# Altium PCB CM5_R6_Serigrafia_VIRTUS.PcbDoc (part 1 of 3)
Units mil, origin at the board's own origin, x right, y up, seen from the top; angles counter-clockwise.
Board outline 7086.61 x 4724.41 mil, 4 copper layers (Top Layer, GND L2, GND L3, Bottom Layer), stack 62.992 mil thick; 227 components, 122 nets, 905 pads, 209 vias.
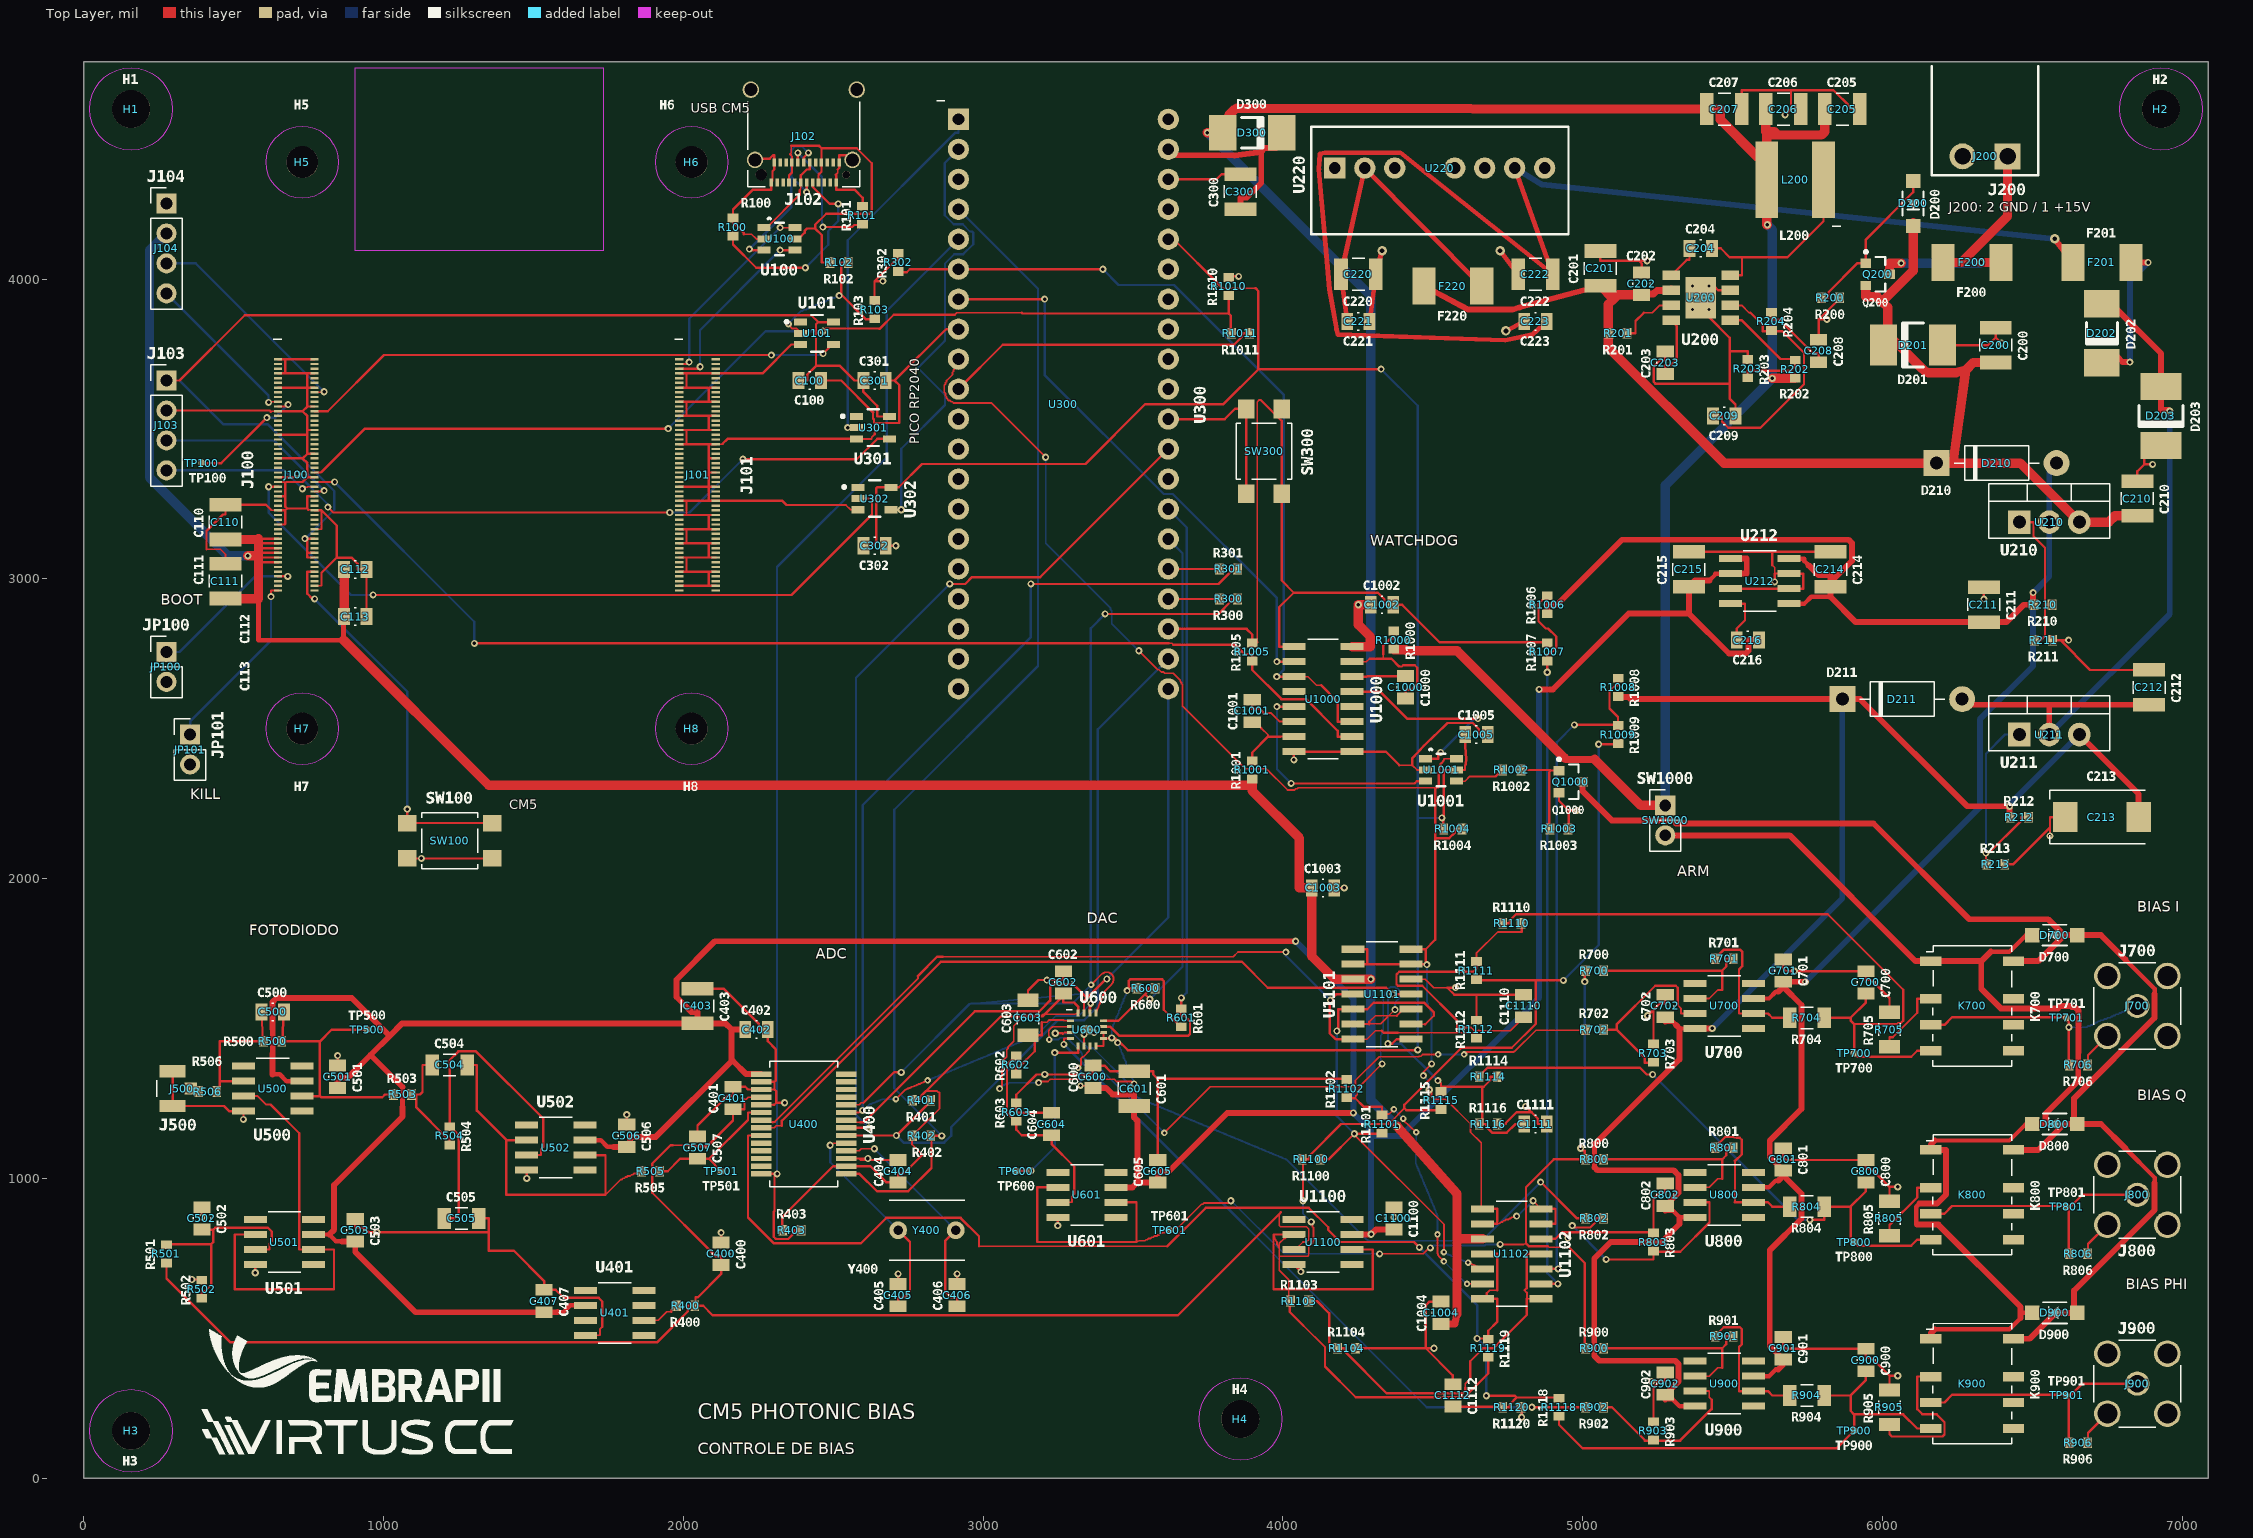
[diagram p0: Top Layer view]
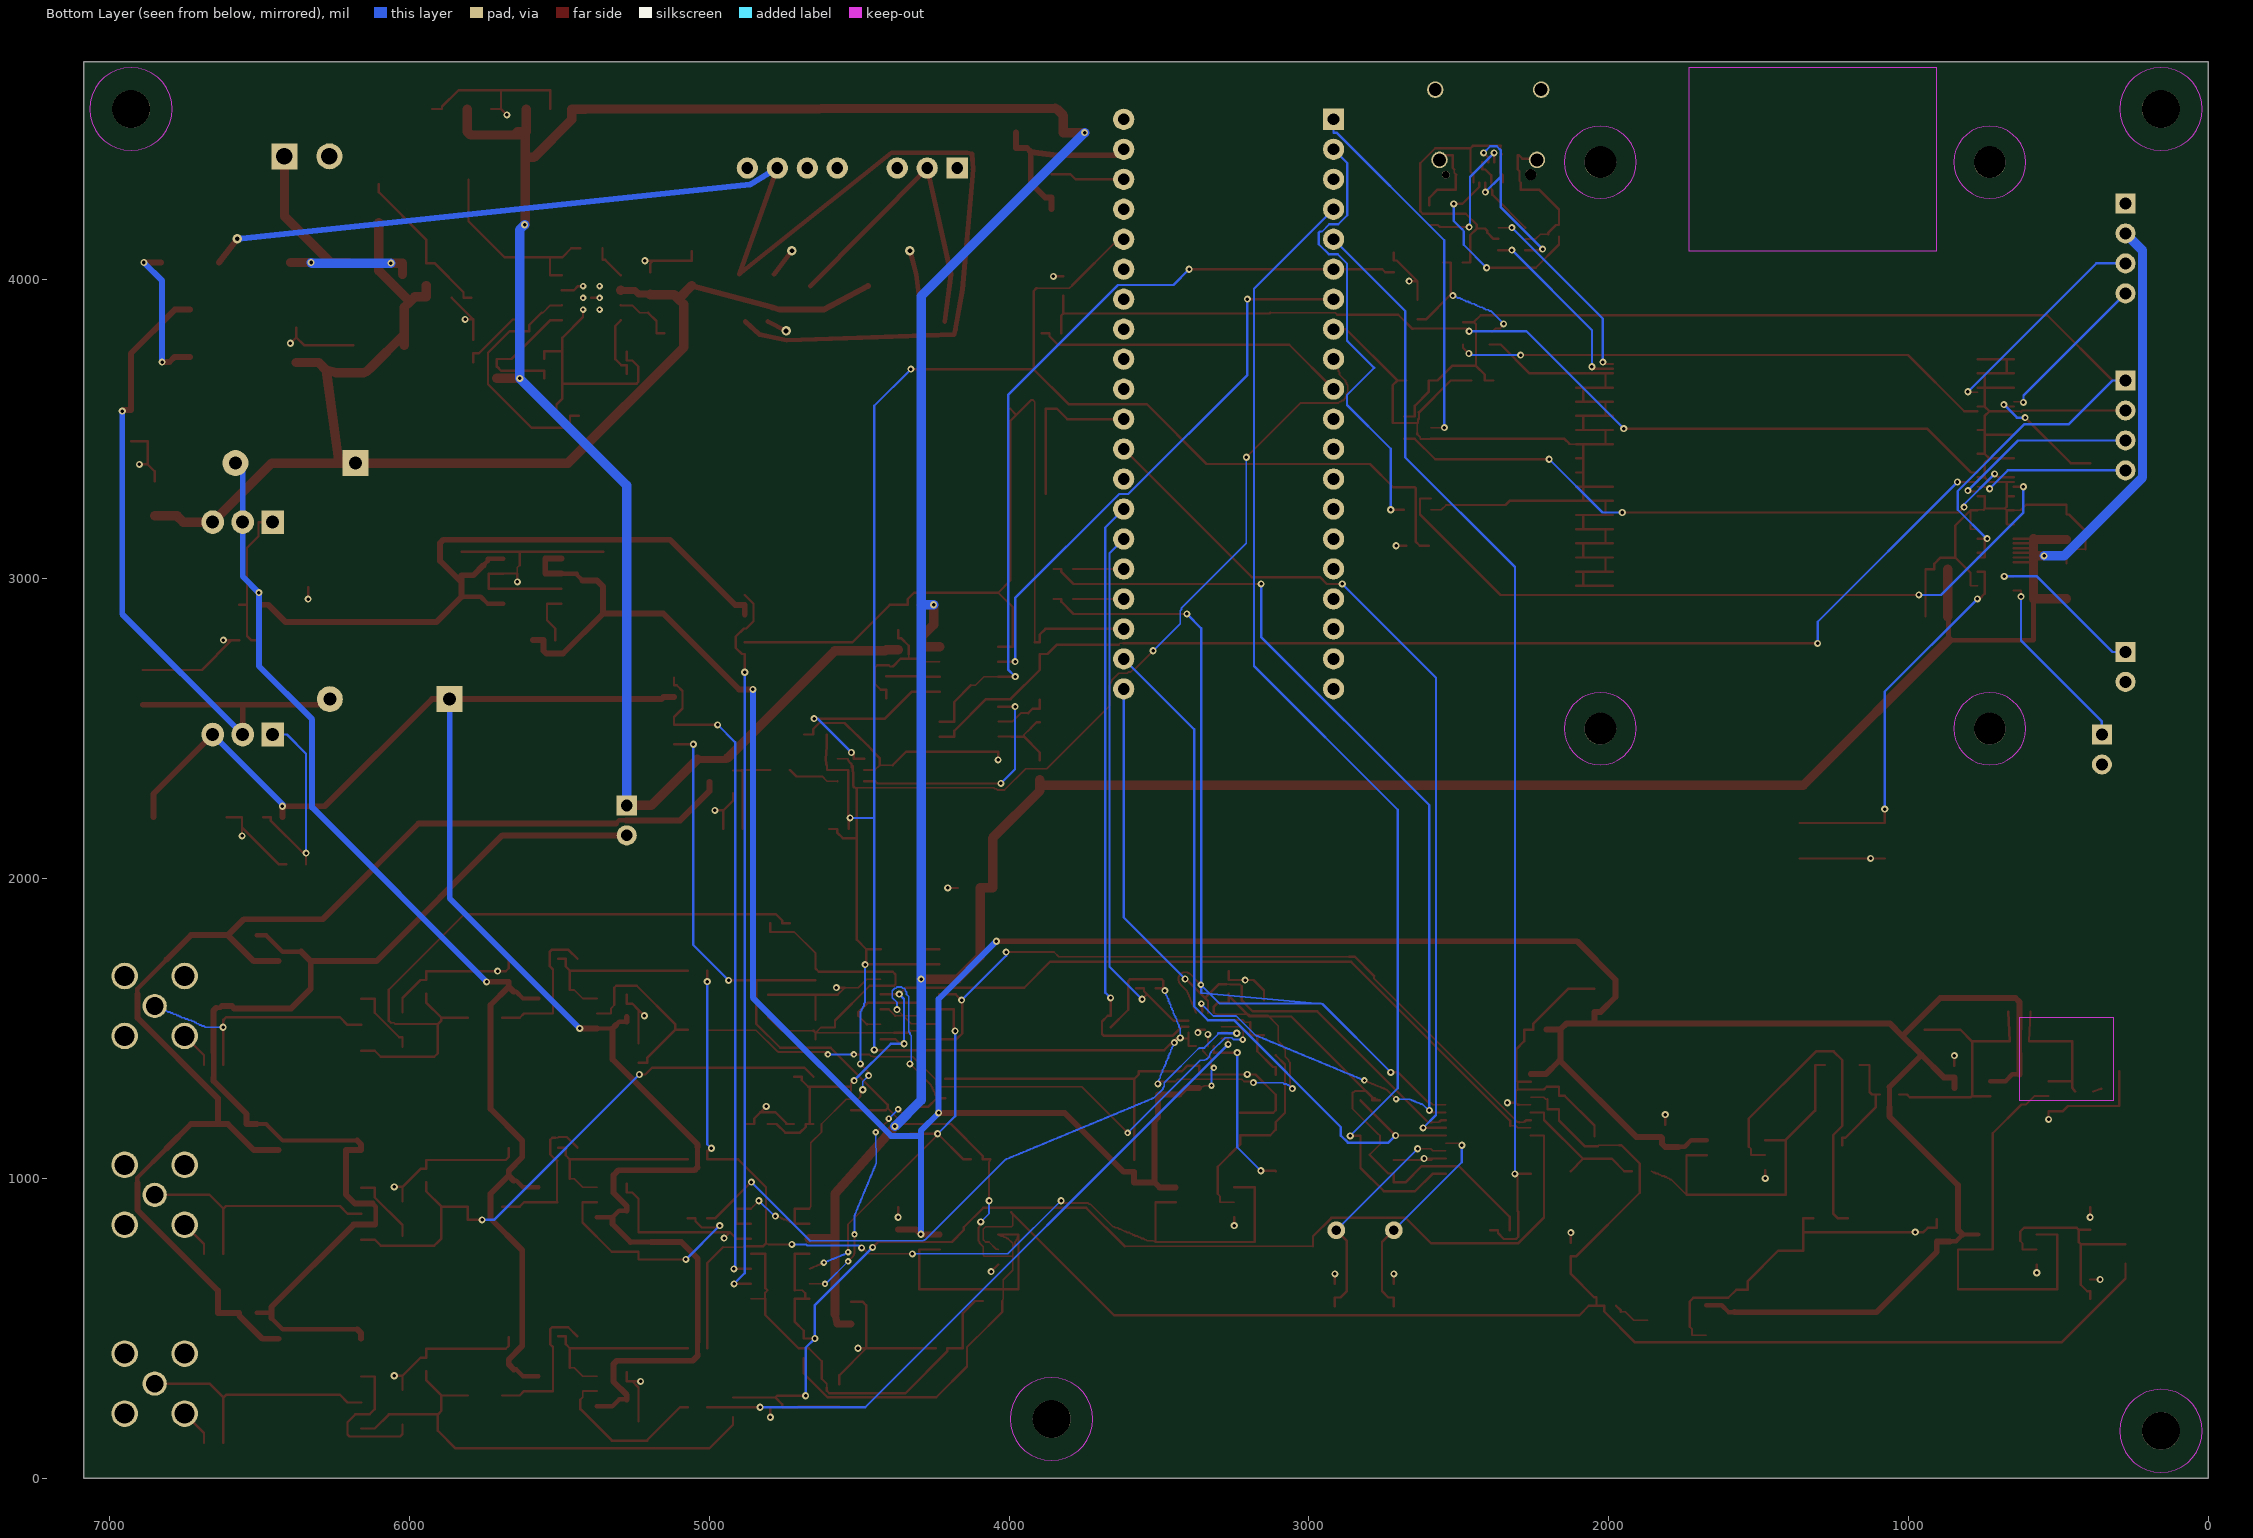
[diagram p1: Bottom Layer view, seen from below]
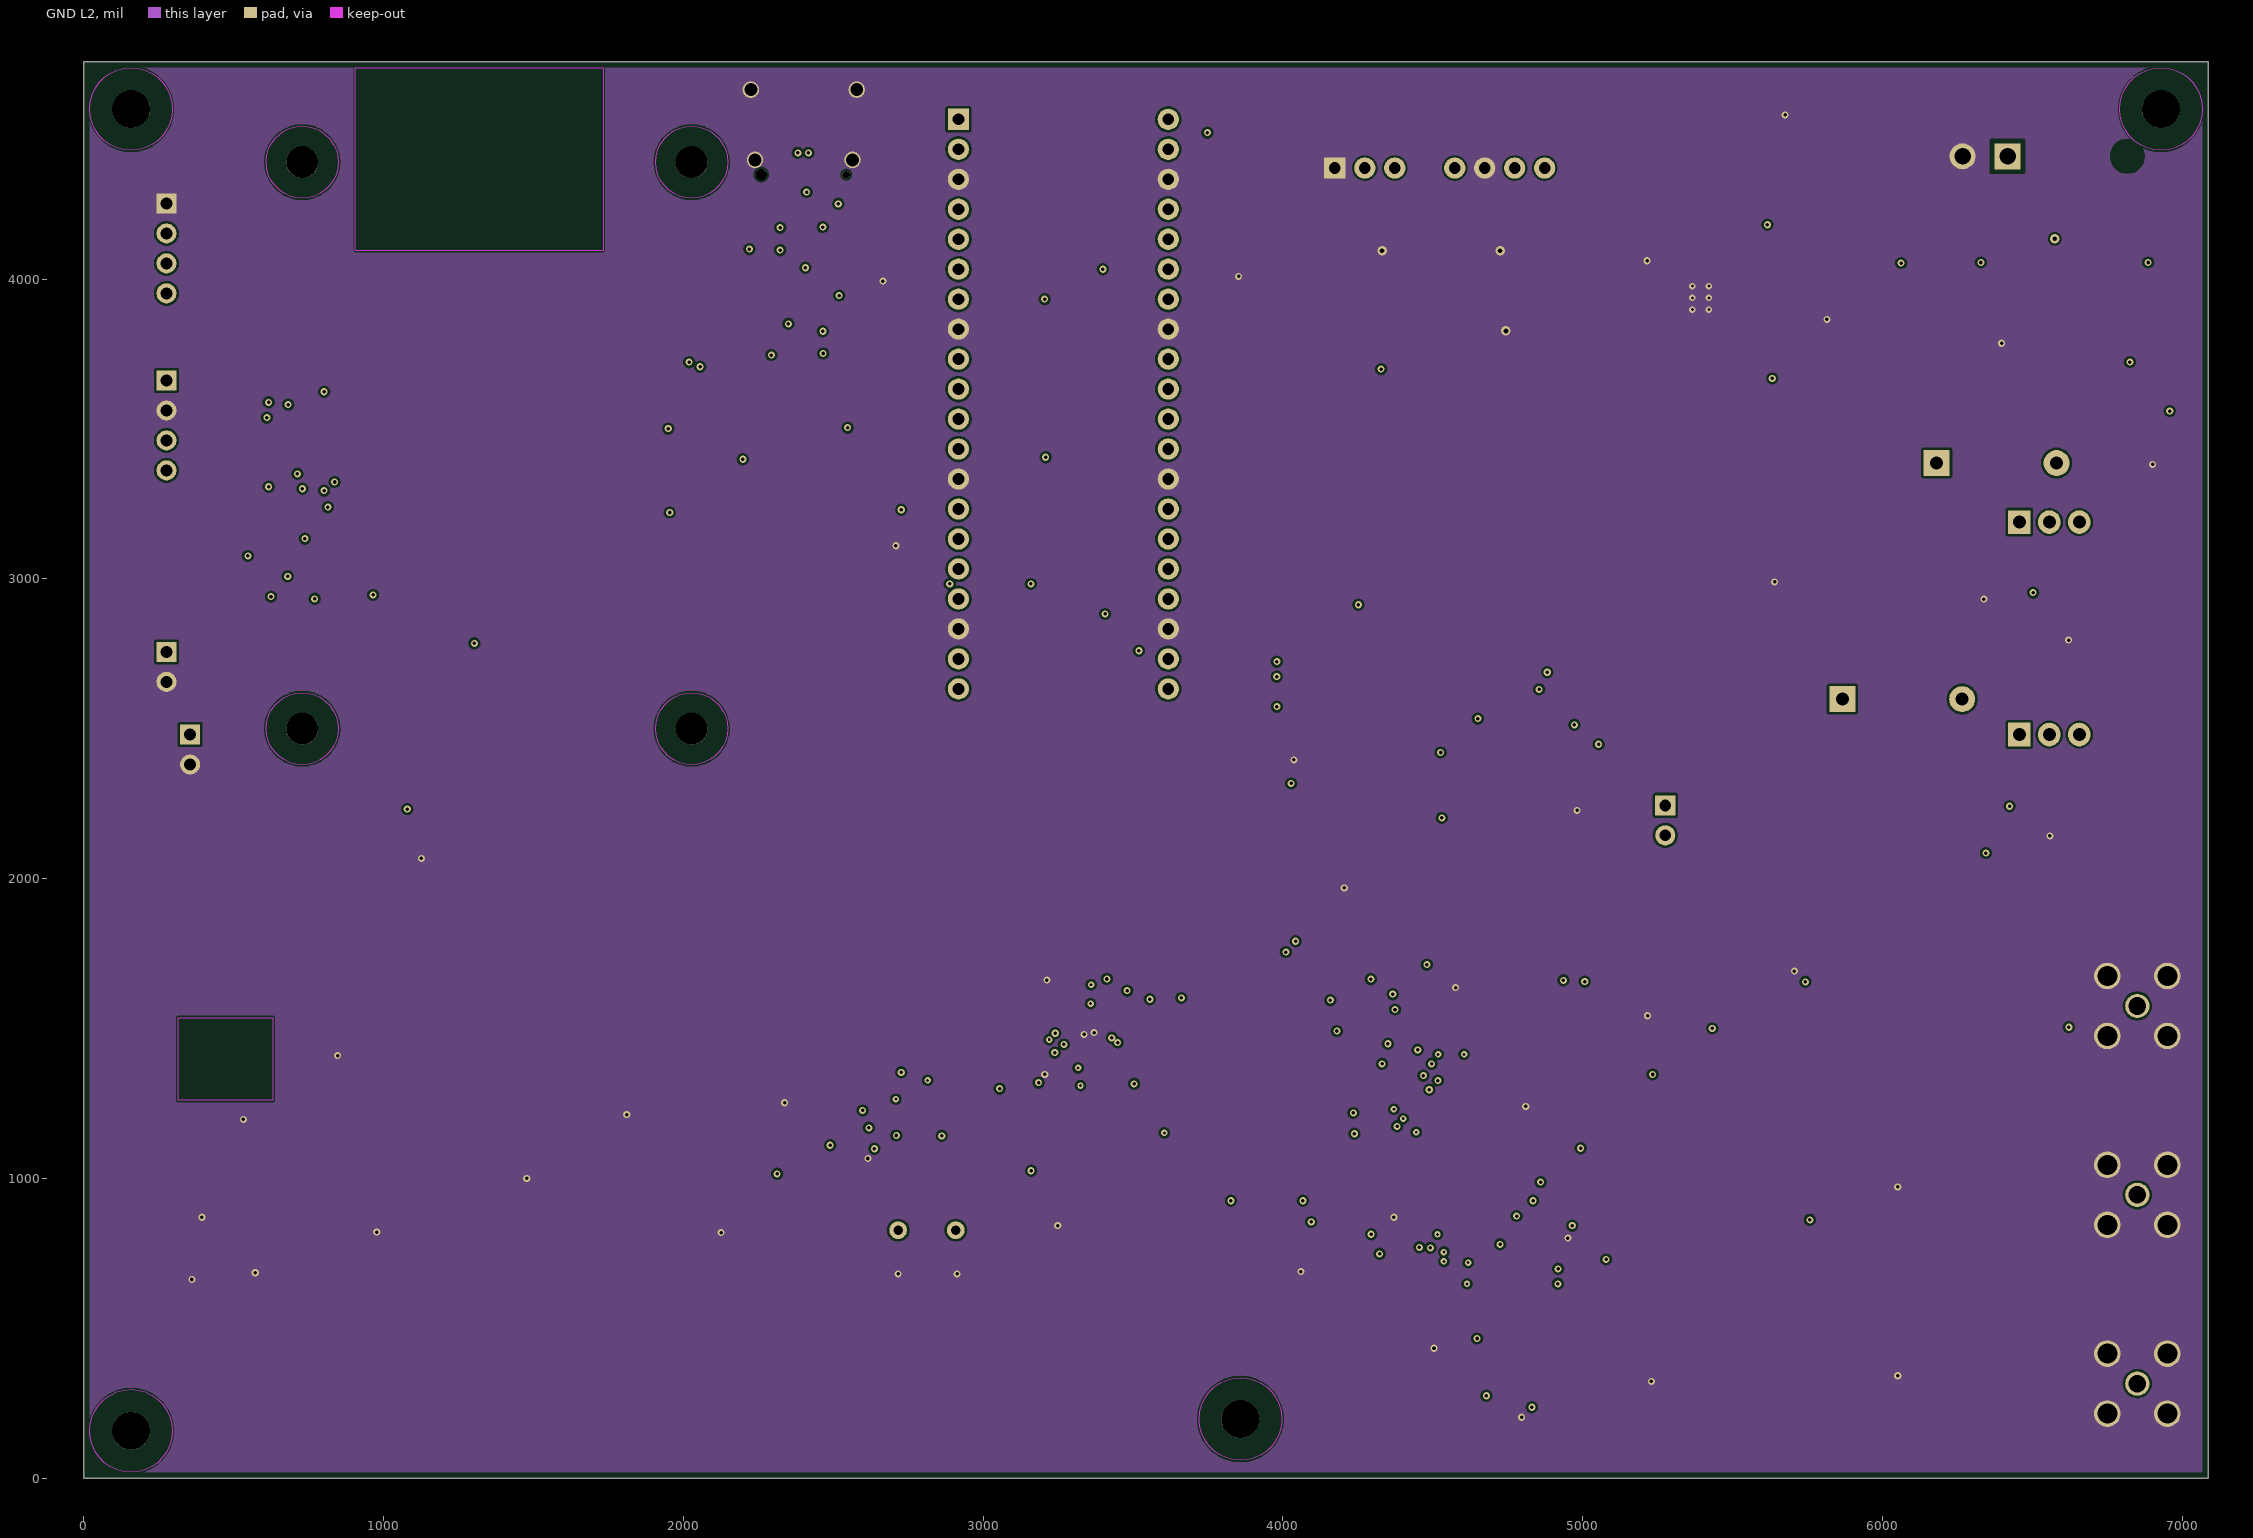
[diagram p2: GND L2]
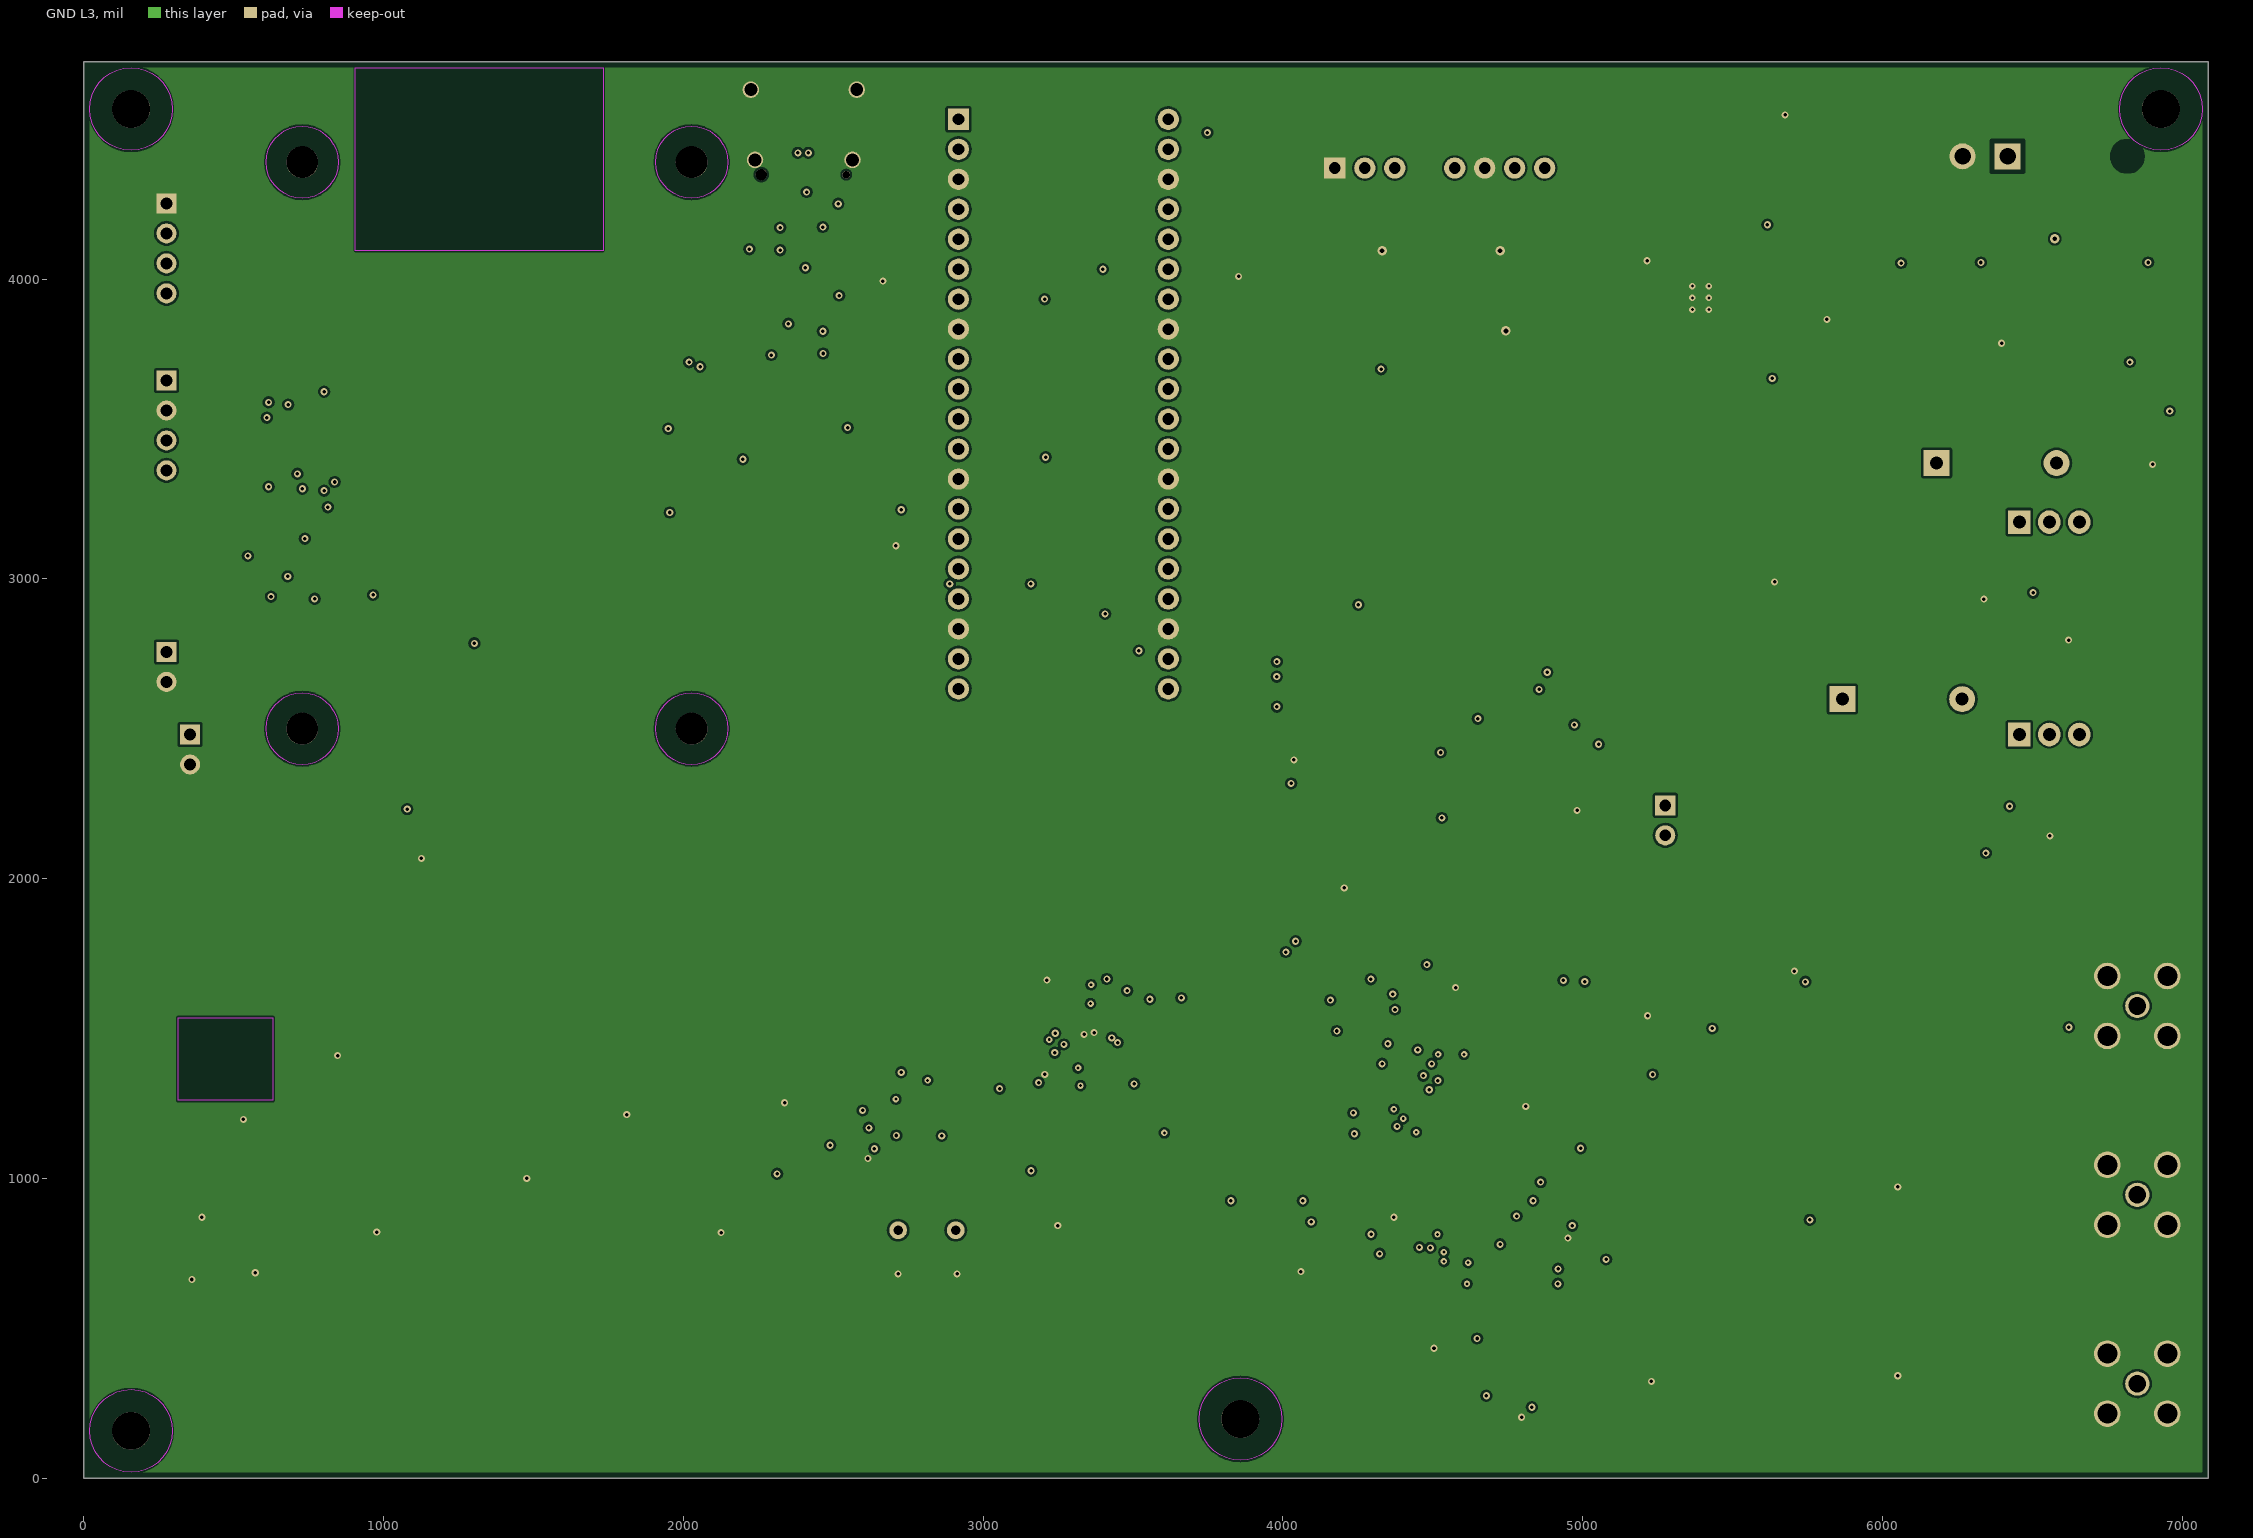
[diagram p3: GND L3]
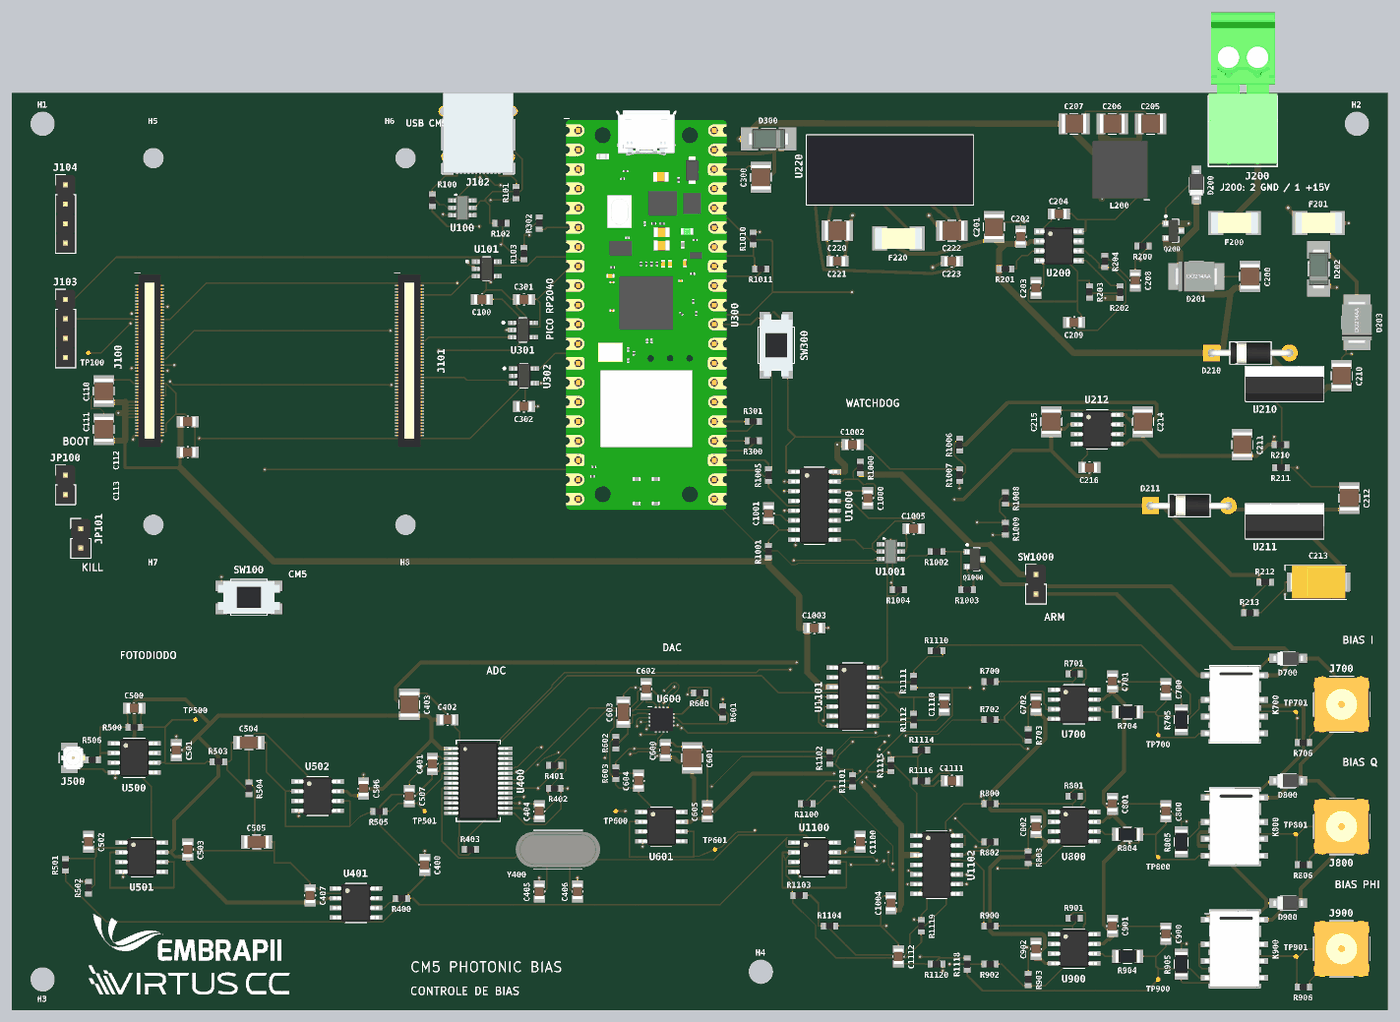
[diagram p6: 3D render of the assembled board from above, using the file's embedded part models]

## Layer stack, top to bottom
Top Solder: solder mask 0.4, Solder Resist, Dk 3.5
Top Layer: signal copper 1.378
Prepreg L1-L2: dielectric 5.9055, FR-4, Dk 4.2
GND L2: signal copper 1.378
Dielectric 1: dielectric 45.6693, FR-4, Dk 4.2
GND L3: signal copper 1.378
Prepreg L3-L4: dielectric 5.9055, FR-4, Dk 4.2
Bottom Layer: signal copper 1.378
Bottom Solder: solder mask 0.4, Solder Resist, Dk 3.5

## Board outline
0,4724.41 7086.61,4724.41 7086.61,0 0,0

## Design rules (kind name [scope] priority, off if disabled: settings)
Clearance Clearance_0_15mm [All] p1: gap=5.91 ignorepadtopadclearanceinfootprint=TRUE
HoleSize Hole_Mounting_NPTH [IsPad And (PadIsPlated = 'False') And (AsMM(HoleSize) > 2.54)] p1: absolutevalues=TRUE maxlimit=126.02 minlimit=106.26 maxpercent=100.000 minpercent=0.000 // R6
HoleSize Hole_Default [Not (IsPad And (PadIsPlated = 'False') And (AsMM(HoleSize) > 2.54))] p2: absolutevalues=TRUE maxlimit=100 minlimit=1 maxpercent=80.000 minpercent=20.000 // R6
MinimumSolderMaskSliver Mask_FinePitch_010mm [InComponent('J100') OR InComponent('J101') OR InComponent('J102') OR InComponent('U400') OR InComponent('U600')] p1: minsoldermaskwidth=3.94 // R6
MinimumSolderMaskSliver Mask_Default_0254mm [All] p2: minsoldermaskwidth=10 // R6
PolygonConnect [All] p1: connectstyle=Relief reliefconductorwidth=10 reliefentries=4 polygonreliefangle="90 Angle" airgapwidth=10
RoutingVias Via_060_030 [All] p1: holewidth=11.81 width=23.62 viastyle="Through Hole" minholewidth=9.84 minwidth=21.65 maxholewidth=23.62 maxwidth=47.24
SolderMaskExpansion Mask_Vias_Tented [IsVia] p1: expansion=-39.37 istentingtop=TRUE // R6
SolderMaskExpansion [All] p2: expansion=4 istentingtop=FALSE
Width Width_Default [All] p1: maxlimit=196.85 minlimit=5.91 preferedwidth=7.87
28 further rules are at their usual default settings.

## Components (designator, comment, footprint, x,y, rotation, side; value= is the part's Value field where it differs from the comment)
C100 "100 nF / 50 V X7R" C0805 2421.26,3661.42 r0 top
C110 "47 uF / 10 V X7R" C1210 472.44,3188.98 r90 top
C111 "47 uF / 10 V X7R" C1210 472.44,2992.13 r90 top
C112 "100 nF / 50 V X7R" C0805 905.51,3031.5 r0 top
C113 "100 nF / 50 V X7R" C0805 905.51,2874.02 r0 top
C200 "10 uF / 50 V X7R" C1210 6377.95,3779.53 r90 top
C201 "10 uF / 50 V X7R" C1210 5059.06,4035.43 r90 top
C202 "100 nF / 50 V X7R" C0805 5196.85,3984.25 r90 top
C203 "10 nF / 50 V X7R" C0805 5275.59,3720.47 r90 top
C204 "100 nF / 50 V X7R" C0805 5393.7,4102.36 r0 top
C205 "22 uF / 25 V X7R" C1210 5866.14,4566.93 r0 top
C206 "22 uF / 25 V X7R" C1210 5669.29,4566.93 r0 top
C207 "22 uF / 25 V X7R" C1210 5472.44,4566.93 r0 top
C208 "2.7 nF / 50 V C0G" C0805 5787.4,3759.84 r90 top
C209 "33 pF / 50 V C0G" C0805 5472.44,3543.31 r0 top
C210 "10 uF / 50 V X7R" C1210 6850.39,3267.72 r90 top
C211 "10 uF / 50 V X7R" C1210 6338.58,2913.39 r90 top
C212 "10 uF / 50 V X7R" C1210 6889.76,2637.8 r90 top
C213 "10 uF / 35 V tantalum" TANT_D 6732.28,2204.72 r0 top
C214 "10 uF / 50 V X7R" C1210 5826.77,3031.5 r90 top
C215 "10 uF / 50 V X7R" C1210 5354.33,3031.5 r90 top
C216 "10 nF / 50 V C0G" C0805 5551.18,2795.28 r0 top
C220 "Comment" C1210 4251.97,4015.75 r0 top
C221 "Comment" C0805 4251.97,3858.27 r0 top
C222 "Comment" C1210 4842.52,4015.75 r0 top
C223 "Comment" C0805 4842.52,3858.27 r0 top
C300 "10 uF / 50 V X7R" C1210 3858.27,4291.34 r90 top
C301 "100 nF / 50 V X7R" C0805 2637.8,3661.42 r0 top
C302 "100 nF / 50 V X7R" C0805 2637.8,3110.24 r0 top
C400 "1 uF / 25 V X7R" C0805 2125.98,748.03 r90 top
C401 "100 nF / 50 V X7R" C0805 2165.35,1267.72 r90 top
C402 "100 nF / 50 V X7R" C0805 2244.09,1496.06 r0 top
C403 "10 uF / 50 V X7R" C1210 2047.24,1574.8 r90 top
C404 "100 nF / 50 V X7R" C0805 2716.54,1023.62 r90 top
C405 "27 pF / 50 V C0G" C0805 2716.54,610.24 r90 top
C406 "27 pF / 50 V C0G" C0805 2913.39,610.24 r90 top
C407 "100 nF / 50 V X7R" C0805 1535.43,590.55 r90 top
C500 "100 pF / 50 V C0G" C0805 629.92,1555.12 r0 top
C501 "100 nF / 50 V X7R" C0805 846.46,1338.58 r90 top
C502 "1 uF / 25 V X7R" C0805 393.7,866.14 r90 top
C503 "100 nF / 50 V X7R" C0805 905.51,826.77 r90 top
C504 "100 nF / 50 V C0G" C1206 1220.47,1377.95 r0 top
C505 "47 nF / 50 V C0G" C1206 1259.84,866.14 r0 top
C506 "100 nF / 50 V X7R" C0805 1811.02,1141.73 r90 top
C507 "10 nF / 50 V C0G" C0805 2047.24,1102.36 r90 top
C600 "100 nF / 50 V X7R" C0805 3366.14,1338.58 r90 top
C601 "10 uF / 50 V X7R" C1210 3503.94,1299.21 r90 top
C602 "100 nF / 50 V X7R" C0805 3267.72,1653.54 r90 top
C603 "150 nF / 50 V X7R" C1206 3149.61,1535.43 r90 top
C604 "1 uF / 25 V X7R" C0805 3228.35,1181.1 r90 top
C605 "100 nF / 50 V X7R" C0805 3582.68,1023.62 r90 top
C700 "1 uF / 25 V X7R" C0805 5944.88,1653.54 r90 top
C701 "100 nF / 50 V X7R" C0805 5669.29,1692.91 r90 top
C702 "100 nF / 50 V X7R" C0805 5275.59,1574.8 r90 top
C800 "1 uF / 25 V X7R" C0805 5944.88,1023.62 r90 top
C801 "100 nF / 50 V X7R" C0805 5669.29,1062.99 r90 top
C802 "100 nF / 50 V X7R" C0805 5275.59,944.88 r90 top
C900 "1 uF / 25 V X7R" C0805 5944.88,393.7 r90 top
C901 "100 nF / 50 V X7R" C0805 5669.29,433.07 r90 top
C902 "100 nF / 50 V X7R" C0805 5275.59,314.96 r90 top
C1000 "1 uF / 25 V X7R" C0805 4409.45,2637.8 r90 top
C1001 "1 uF / 25 V X7R" C0805 3897.64,2559.06 r90 top
C1002 "100 nF / 50 V X7R" C0805 4330.71,2913.39 r0 top
C1003 "100 nF / 50 V X7R" C0805 4133.86,1968.5 r0 top
C1004 "100 nF / 50 V X7R" C0805 4527.56,551.18 r90 top
C1005 "100 nF / 50 V X7R" C0805 4645.67,2480.31 r0 top
C1100 "100 nF / 50 V X7R" C0805 4370.08,866.14 r90 top
C1110 "1 nF / 50 V C0G" C0805 4803.15,1574.8 r90 top
C1111 "1 nF / 50 V C0G" C0805 4842.52,1181.1 r0 top
C1112 "1 nF / 50 V C0G" C0805 4566.93,275.59 r90 top
D200 "BZT52C12 / zener 12 V" SOD-123 6102.36,4251.97 r90 top
D201 "SMBJ18A / TVS" DO-214AA 6102.36,3779.53 r0 top
D202 "B340A / 3 A 40 V" DO-214AC 6732.28,3818.9 r90 top
D203 "SMBJ18A / TVS" DO-214AA 6929.13,3543.31 r90 top
D210 "1N4007" D_DO41_P10 6181.1,3385.83 r0 top
D211 "1N4007" D_DO41_P10 5866.14,2598.43 r0 top
D300 "SS14" DO-214AC 3897.64,4488.19 r180 top
D700 "1N4148W / flyback" SOD-123 6574.8,1811.02 r0 top
D800 "1N4148W / flyback" SOD-123 6574.8,1181.1 r0 top
D900 "1N4148W / flyback" SOD-123 6574.8,551.18 r0 top
F200 "T3 A / 125 V" FUSE_NANO2 6299.21,4055.12 r0 top
F201 "F250 mA / 125 V" FUSE_NANO2 6732.28,4055.12 r0 top
F220 "Comment" FUSE_NANO2 4566.93,3976.38 r0 top
H1 "M3 NPTH" NPTH_M3_3.2mm 157.48,4566.93 r0 top
H2 "M3 NPTH" NPTH_M3_3.2mm 6929.13,4566.93 r0 top
H3 "M3 NPTH" NPTH_M3_3.2mm 157.48,157.48 r0 top
H4 "M3 NPTH" NPTH_M3_3.2mm 3858.27,196.85 r0 top
H5 "CM5 M2.5 NPTH" NPTH_CM5_M2.5_2.7mm 728.35,4389.76 r0 top
H6 "CM5 M2.5 NPTH" NPTH_CM5_M2.5_2.7mm 2027.56,4389.76 r0 top
H7 "CM5 M2.5 NPTH" NPTH_CM5_M2.5_2.7mm 728.35,2500 r0 top
H8 "CM5 M2.5 NPTH" NPTH_CM5_M2.5_2.7mm 2027.56,2500 r0 top
J100 "CM5 carrier / 100 vias" CM5_BERG100 708.66,3346.46 r0 top
J101 "CM5 carrier / 100 vias" CM5_BERG100 2047.24,3346.46 r0 top
J102 "USB-C / 12401610E4#2A" USB_C_12401610 2401.57,4519.69 r180 top
J103 "I2C / display opcional" HDR_1X04_P254 275.59,3661.42 r0 top
J104 "FAN / 5 V" HDR_1X04_P254 275.59,4251.97 r0 top
J200 "5444262 / 2 vias" 5444262 6417.32,4409.45 r180 top
J500 "U.FL / sinal eletrico" HIROSE_UFL 314.96,1299.21 r180 top
J700 "SMA / DC BIAS" SMA_132134 6850.39,1574.8 r0 top
J800 "SMA / DC BIAS" SMA_132134 6850.39,944.88 r0 top
J900 "SMA / DC BIAS" SMA_132134 6850.39,314.96 r0 top
JP100 "BOOT / ABERTO" HDR_1X02_P254 275.59,2755.91 r0 top
JP101 "KILL / ABERTO" HDR_1X02_P254 354.33,2480.31 r0 top
K700 "G6K-2F-Y DC5" G6K_2F_Y 6299.21,1574.8 r0 top
K800 "G6K-2F-Y DC5" G6K_2F_Y 6299.21,944.88 r0 top
K900 "G6K-2F-Y DC5" G6K_2F_Y 6299.21,314.96 r0 top
L200 "3.3 uH / XAL7070-332MEC" XAL7070 5708.66,4330.71 r180 top
Q200 "DMP4065S-7" ONSC-SOT-23-3-318-08_V 5984.25,4015.75 r0 top
Q1000 "AO3400A" ONSC-SOT-23-3-318-08_V 4960.63,2322.83 r0 top
R100 "5.1k / 1%" R-0603 2165.35,4173.23 r90 top
R101 "5.1k / 1%" R-0603 2597.44,4212.6 r90 top
R102 "10k / 1%" R-0603 2519.68,4055.12 r0 top
R103 "100k / 1%" R-0603 2637.8,3897.64 r90 top
R200 "100k / 1%" R-0603 5826.77,3937.01 r0 top
R201 "100k / 1%" R-0603 5118.11,3818.9 r0 top
R202 "118k / 0.1%" R-0603 5708.66,3698.82 r90 top
R203 "22.1k / 0.1%" R-0603 5551.18,3700.79 r90 top
R204 "15.8k / 1%" R-0603 5629.92,3858.27 r90 top
R210 "120R / 0.1%" R-0603 6535.43,2913.39 r0 top
R211 "931R / 0.1%" R-0603 6537.4,2795.28 r0 top
R212 "120R / 0.1%" R-0603 6456.69,2204.72 r0 top
R213 "931R / 0.1%" R-0603 6377.95,2047.24 r0 top
R300 "33R / 1%" R-0603 3818.9,2932.68 r0 top
R301 "33R / 1%" R-0603 3818.9,3032.68 r0 top
R302 "47k / 1%" R-0603 2716.54,4055.12 r90 top
R400 "0R / jumper" R-0603 2007.87,574.8 r0 top
R401 "10k / 1%" R-0603 2795.28,1259.84 r0 top
R402 "10k / 1%" R-0603 2795.28,1141.73 r0 top
R403 "10k / 1%" R-0603 2362.2,826.77 r0 top
R500 "220k / 0.1%" R-0603 629.92,1456.69 r0 top
R501 "90.9k / 0.1%" R-0603 275.59,748.03 r90 top
R502 "10.0k / 0.1%" R-0603 393.7,629.92 r90 top
R503 "10.0k / 1%" R-0603 1062.99,1279.53 r0 top
R504 "10.0k / 1%" R-0603 1220.47,1141.73 r90 top
R505 "100R / 1%" R-0603 1890.75,1023.62 r0 top
R506 "Comment" R-0603 413.39,1289.37 r0 top
R600 "10k / 1%" R-0603 3543.31,1633.86 r0 top
R601 "10k / 1%" R-0603 3661.42,1535.43 r90 top
R602 "10.0k / 0.1%" R-0603 3110.24,1377.95 r90 top
R603 "10.0k / 0.1%" R-0603 3110.24,1220.47 r90 top
R700 "10.0k / 0.1%" R-0603 5039.37,1692.91 r0 top
R701 "63.4k / 0.1%" R-0603 5472.44,1732.28 r0 top
R702 "10.0k / 0.1%" R-0603 5039.37,1496.06 r0 top
R703 "63.4k / 0.1%" R-0603 5236.22,1417.32 r90 top
R704 "220R / 1% / 0.667 W" R1206 5748.03,1535.43 r0 top
R705 "1k / 1% / 0.25 W" R1206 6023.62,1496.06 r90 top
R706 "1M / 1%" R-0603 6653.54,1377.95 r0 top
R800 "10.0k / 0.1%" R-0603 5039.37,1062.99 r0 top
R801 "63.4k / 0.1%" R-0603 5472.44,1102.36 r0 top
R802 "10.0k / 0.1%" R-0603 5039.37,866.14 r0 top
R803 "63.4k / 0.1%" R-0603 5236.22,787.4 r90 top
R804 "220R / 1% / 0.667 W" R1206 5748.03,905.51 r0 top
R805 "1k / 1% / 0.25 W" R1206 6023.62,866.14 r90 top
R806 "1M / 1%" R-0603 6653.54,748.03 r0 top
R900 "10.0k / 0.1%" R-0603 5039.37,433.07 r0 top
R901 "63.4k / 0.1%" R-0603 5472.44,472.44 r0 top
R902 "10.0k / 0.1%" R-0603 5039.37,236.22 r0 top
R903 "63.4k / 0.1%" R-0603 5236.22,157.48 r90 top
R904 "220R / 1% / 0.667 W" R1206 5748.03,275.59 r0 top
R905 "1k / 1% / 0.25 W" R1206 6023.62,236.22 r90 top
R906 "1M / 1%" R-0603 6653.54,118.11 r0 top
R1000 "1.00M / 1%" R-0603 4370.08,2795.28 r90 top
R1001 "1.00M / 1%" R-0603 3897.64,2362.2 r90 top
R1002 "100R / 1%" R-0603 4763.78,2362.2 r0 top
R1003 "100k / 1%" R-0603 4921.26,2165.35 r0 top
R1004 "10k / 1%" R-0603 4566.93,2165.35 r0 top
R1005 "47k / 1%" R-0603 3897.64,2755.91 r90 top
R1006 "56.0k / 0.1%" R-0603 4881.89,2913.39 r90 top
R1007 "10.0k / 0.1%" R-0603 4881.89,2755.91 r90 top
R1008 "113k / 0.1%" R-0603 5118.11,2637.8 r90 top
R1009 "10.0k / 0.1%" R-0603 5118.11,2480.31 r90 top
R1010 "47k / 1%" R-0603 3818.9,3975.39 r90 top
R1011 "1k / 1%" R-0603 3858.27,3818.9 r0 top
R1100 "11.0k / 0.1%" R-0603 4094.49,1062.99 r0 top
R1101 "78.7k / 0.1%" R-0603 4330.71,1181.1 r90 top
R1102 "11.0k / 0.1%" R-0603 4212.6,1299.21 r90 top
R1103 "10.0k / 0.1%" R-0603 4055.12,590.55 r0 top
R1104 "15.0k / 0.1%" R-0603 4212.6,433.07 r0 top
R1110 "80.6k / 0.1%" R-0603 4763.78,1850.39 r0 top
R1111 "20.0k / 0.1%" R-0603 4645.67,1692.91 r90 top
R1112 "26.7k / 0.1%" R-0603 4645.67,1497.05 r90 top
R1114 "80.6k / 0.1%" R-0603 4685.04,1338.58 r0 top
R1115 "20.0k / 0.1%" R-0603 4527.56,1259.84 r90 top
R1116 "26.7k / 0.1%" R-0603 4685.04,1181.1 r0 top
R1118 "80.6k / 0.1%" R-0603 4921.26,236.22 r90 top
R1119 "20.0k / 0.1%" R-0603 4685.04,433.07 r90 top
R1120 "26.7k / 0.1%" R-0603 4763.78,236.22 r0 top
SW100 "POWER / botao NA" SW_TL3305A 1220.47,2125.98 r0 top
SW300 "RESET / botao NA" SW_TL3305A 3937.01,3425.2 r90 top
SW1000 "ARM FISICO / ABERTO" HDR_1X02_P254 5275.59,2244.09 r0 top
TP100 "TESTPOINT" TP06R 393.7,3385.83 r0 top
TP500 "TESTPOINT" TP06R 944.88,1496.06 r0 top
TP501 "Comment" TP06R 2125.98,1023.62 r0 top
TP600 "TESTPOINT" TP06R 3110.24,1023.62 r0 top
TP601 "TESTPOINT" TP06R 3622.05,826.77 r0 top
TP700 "TESTPOINT" TP06R 5905.51,1417.32 r0 top
TP701 "TESTPOINT" TP06R 6614.17,1535.43 r0 top
TP800 "TESTPOINT" TP06R 5905.51,787.4 r0 top
TP801 "TESTPOINT" TP06R 6614.17,905.51 r0 top
TP900 "TESTPOINT" TP06R 5905.51,157.48 r0 top
TP901 "TESTPOINT" TP06R 6614.17,275.59 r0 top
U100 "USBLC6-2SC6" SOT26 2320.87,4133.86 r180 top
U101 "SN74LVC1G17DBVR" FP-C04-091-OT-MFG 2445.87,3818.9 r0 top
U200 "AP64501SP-13" AP64501_SO8EP 5393.7,3937.01 r0 top
U210 "LM317T" TO220_3 6456.69,3188.98 r0 top
U211 "LM337T" TO220_3 6456.69,2480.31 r0 top
U212 "LT1763CS8-5#PBF" SOIC8 5590.55,2992.13 r0 top
U220 "Comment" TMR3_SIP8_15V 4173.23,4370.08 r0 top
U300 "Raspberry Pi Pico / SC0915" PICO_TH40 3267.72,3582.68 r0 top
U301 "SN74LVC1G17DBVR" FP-C04-091-OT-MFG 2632.87,3503.94 r0 top
U302 "SN74LVC1G17DBVR" FP-C04-091-OT-MFG 2637.8,3267.72 r0 top
U400 "ADS1256IDB" SSOP28_DB 2401.57,1181.1 r0 top
U401 "ADR431BRZ" SOIC8 1771.65,551.18 r0 top
U500 "OPA380AID" SOIC8 629.92,1299.21 r0 top
U501 "OPA197ID" SOIC8 669.29,787.4 r0 top
U502 "OPA197ID" SOIC8 1574.8,1102.36 r0 top
U600 "DAC80504RTER" DAC80504_RTE 3346.46,1496.06 r0 top
U601 "OPA197ID" SOIC8 3346.46,944.88 r0 top
U700 "OPA197ID" SOIC8 5472.44,1574.8 r0 top
U800 "OPA197ID" SOIC8 5472.44,944.88 r0 top
U900 "OPA197ID" SOIC8 5472.44,314.96 r0 top
U1000 "CD74HCT123M96" SOIC16 4133.86,2598.43 r0 top
U1001 "SN74LVC1G11DBVR" SOT26 4527.56,2362.2 r180 top
U1100 "OPA197ID" SOIC8 4133.86,787.4 r0 top
U1101 "LM339BDR" SOIC14 4330.71,1614.17 r0 top
U1102 "LM339BDR" SOIC14 4763.78,748.03 r0 top
Y400 "7.680 MHz / CL18pF" XTAL_HC49 2716.54,826.77 r0 top

## Footprints (in the part's own frame and the unit in brackets; to place one, negate y for a bottom-side part, rotate by r counter-clockwise, add the part's x,y. Pads: shape width x height; smd on the part's side, far side on the other; paste and mask are expansions set on the pad)
5444262 [mm]
  rect 2.2x2.2 hole 1.4 mask+0.1: 1(0,0)
  round 2.2 hole 1.4 mask+0.1: 2(3.81,0)
  silkscreen extent -2.6,-7.65 6.41,3.3, body extent -2.6,-18.6 6.41,1.35, height 7.7
AP64501_SO8EP [mm]
  rect 1.505x0.802 smd paste+0 mask+0.05: 1(-2.497,1.905) 2(-2.497,0.635) 3(-2.497,-0.635) 4(-2.497,-1.905) 5(2.498,-1.905) 6(2.498,-0.635) 7(2.498,0.635) 8(2.498,1.905)
  rect 2.613x3.502 smd paste-3.502 mask+0.05: 9(0,0)
  silkscreen extent -1.57,-4 1.47,-3, body extent -3,-2.45 3,2.45, height 1.75
C0805 [mm]
  rect 1x1.45 smd paste+0 mask+0.05: 1(-0.95,0) 2(0.95,0)
  silkscreen extent -1.26,-2.05 1.15,0.73, body extent -1,-0.63 1,0.63, height 1.25
C1206 [mm]
  rect 1.15x1.8 smd paste+0 mask+0.05: 1(-1.475,0) 2(1.475,0)
  silkscreen extent -1.26,-0.91 1.17,2.23, body extent -1.6,-0.8 1.6,0.8, height 1.6
C1210 [mm]
  rect 1.15x2.7 smd paste+0 mask+0.05: 1(-1.475,0) 2(1.475,0)
  silkscreen extent -1.26,-1.36 1.15,2.68, body extent -1.6,-1.25 1.6,1.25, height 2.5
CM5_BERG100 [mm]
  rect 0.7x0.2 smd paste+0 mask+0.03: 1(-1.54,9.8) 2(1.54,9.8) 3(-1.54,9.4) 4(1.54,9.4) 5(-1.54,9) 6(1.54,9) 7(-1.54,8.6) 8(1.54,8.6) 9(-1.54,8.2) 10(1.54,8.2) 11(-1.54,7.8) 12(1.54,7.8) 13(-1.54,7.4) 14(1.54,7.4) 15(-1.54,7) 16(1.54,7) 17(-1.54,6.6) 18(1.54,6.6) 19(-1.54,6.2) 20(1.54,6.2) 21(-1.54,5.8) 22(1.54,5.8) 23(-1.54,5.4) 24(1.54,5.4) 25(-1.54,5) 26(1.54,5) 27(-1.54,4.6) 28(1.54,4.6) 29(-1.54,4.2) 30(1.54,4.2) 31(-1.54,3.8) 32(1.54,3.8) 33(-1.54,3.4) 34(1.54,3.4) 35(-1.54,3) 36(1.54,3) 37(-1.54,2.6) 38(1.54,2.6) 39(-1.54,2.2) 40(1.54,2.2) 41(-1.54,1.8) 42(1.54,1.8) 43(-1.54,1.4) 44(1.54,1.4) 45(-1.54,1) 46(1.54,1) 47(-1.54,0.6) 48(1.54,0.6) 49(-1.54,0.2) 50(1.54,0.2) 51(-1.54,-0.2) 52(1.54,-0.2) 53(-1.54,-0.6) 54(1.54,-0.6) 55(-1.54,-1) 56(1.54,-1) 57(-1.54,-1.4) 58(1.54,-1.4) 59(-1.54,-1.8) 60(1.54,-1.8) 61(-1.54,-2.2) 62(1.54,-2.2) 63(-1.54,-2.6) 64(1.54,-2.6) 65(-1.54,-3) 66(1.54,-3) 67(-1.54,-3.4) 68(1.54,-3.4) 69(-1.54,-3.8) 70(1.54,-3.8) 71(-1.54,-4.2) 72(1.54,-4.2) 73(-1.54,-4.6) 74(1.54,-4.6) 75(-1.54,-5) 76(1.54,-5) 77(-1.54,-5.4) 78(1.54,-5.4) 79(-1.54,-5.8) 80(1.54,-5.8) 81(-1.54,-6.2) 82(1.54,-6.2) 83(-1.54,-6.6) 84(1.54,-6.6) 85(-1.54,-7) 86(1.54,-7) 87(-1.54,-7.4) 88(1.54,-7.4) 89(-1.54,-7.8) 90(1.54,-7.8) 91(-1.54,-8.2) 92(1.54,-8.2) 93(-1.54,-8.6) 94(1.54,-8.6) 95(-1.54,-9) 96(1.54,-9) 97(-1.54,-9.4) 98(1.54,-9.4) 99(-1.54,-9.8) 100(1.54,-9.8)
  silkscreen extent -4.64,-1.07 -1.24,11.5, body extent -1.66,-11.3 1.66,11.3, height 3.14
D_DO41_P10 [mm]
  rect 2.2x2.2 hole 1.1 paste-2539.97 mask+0.05: 1(0,0)
  round 2.2 hole 1.1 paste-2539.97 mask+0.05: 2(10.16,0)
  silkscreen extent -1.26,-2.69 8.69,1.47, body extent -0.4,-1.36 10.56,1.36, height 3.21
DAC80504_RTE [mm]
  rect 0.6x0.24 smd paste+0 mask+0.05: 1(-1.4,0.75) 2(-1.4,0.25) 3(-1.4,-0.25) 4(-1.4,-0.75) 9(1.4,-0.75) 10(1.4,-0.25) 11(1.4,0.25) 12(1.4,0.75)
  rect 0.24x0.6 smd paste+0 mask+0.05: 5(-0.75,-1.4) 6(-0.25,-1.4) 7(0.25,-1.4) 8(0.75,-1.4) 13(0.75,1.4) 14(0.25,1.4) 15(-0.25,1.4) 16(-0.75,1.4)
  rect 0.8x0.8 smd paste-0.8 mask+0.05: 17(0,0)
  silkscreen extent -1.75,1.7 2.46,3.25, body extent -1.55,-1.55 1.55,1.55, height 0.92
DO-214AA [mm]
  rect 2.3x3.5 smd paste+0 mask+0.05: 1(-2.5,0) 2(2.5,0)
  silkscreen extent -1.26,-3.3 1.17,2, body extent -2.79,-1.97 2.79,1.98, height 2.65
DO-214AC [mm]
  rect 2.3x3 smd paste+0 mask+0.05: 1(-2.5,0) 2(2.5,0)
  silkscreen extent -1.26,-2.83 1.13,1.3, body extent -2.6,-1.3 2.6,1.3, height 2.4
FP-C04-091-OT-MFG [mm]
  rect 1.1x0.6 smd paste+0 mask+0.04: 1(-1.4,0.95) 2(-1.4,0) 3(-1.4,-0.95) 4(1.4,-0.95) 5(1.4,0.95)
  silkscreen extent -2.7,-1.55 1.48,3.1, body extent -1.6,-1.55 1.6,1.55, height 1.45
FUSE_NANO2 [mm]
  rect 1.96x3.15 smd paste+0 mask+0.05: 1(-2.455,0) 2(2.455,0)
  silkscreen extent -1.26,-2.91 1.13,-2.1, body extent -3.05,-1.38 3.05,1.38, height 2.78
G6K_2F_Y [mm]
  rect 1.8x0.8 smd paste+0 mask+0.05: 1(-3.5,3.8) 2(-3.5,0.6) 3(-3.5,-1.6) 4(-3.5,-3.8) 5(3.5,-3.8) 6(3.5,-1.6) 7(3.5,0.6) 8(3.5,3.8)
  silkscreen extent -3.9,-5.1 5.73,5.1, body extent -3.9,-5 3.9,5, height 5.58
HDR_1X02_P254 [mm]
  rect 1.7x1.7 hole 1 paste-2539.97 mask+0.05: 1(0,0)
  round 1.7 hole 1 paste-2539.97 mask+0.05: 2(0,-2.54)
  silkscreen extent -1.95,-3.87 1.88,2.82, body extent -1.27,-3.81 1.27,1.27, height 8.54
HDR_1X04_P254 [mm]
  rect 1.7x1.7 hole 1 paste-2539.97 mask+0.05: 1(0,0)
  round 1.7 hole 1 paste-2539.97 mask+0.05: 2(0,-2.54) 3(0,-5.08) 4(0,-7.62)
  silkscreen extent -1.57,-8.95 1.46,2.82, body extent -1.27,-8.89 1.27,1.27, height 8.54
HIROSE_UFL [mm]
  rect 1.05x1 smd paste+0 mask+0.05: 1(-1.05,0)
  rect 2.2x1.05 smd paste+0 mask+0.05: 2(0.475,1.475) 2(0.475,-1.475)
  silkscreen extent -1.46,-0.69 1.84,3.55, body extent -1.55,-1.5 1.55,1.5, height 1.25
NPTH_CM5_M2.5_2.7mm [mm]
  round 2.7 hole 2.7 unplated paste-2539.97 mask+0: ""(0,0)
  silkscreen extent -0.65,4.48 0.5,5.28
NPTH_M3_3.2mm [mm]
  round 3.2 hole 3.2 unplated paste-2539.97 mask+0: ""(0,0)
  silkscreen extent -0.65,2.13 0.55,2.93
ONSC-SOT-23-3-318-08_V [mm]
  rect 0.9x0.8 smd paste+0 mask+0.05: 1(-1,0.95) 2(-1,-0.95) 3(1,0)
  silkscreen extent -1.26,-2.83 0.84,2.02, body extent -1.28,-1.5 1.28,1.5, height 1.15
PICO_TH40 [mm]
  rect 1.8x1.8 hole 1 paste-2539.97 mask+0.05: 1(-8.89,24.13)
  round 1.8 hole 1 paste-2539.97 mask+0.05: 2(-8.89,21.59) 3(-8.89,19.05) 4(-8.89,16.51) 5(-8.89,13.97) 6(-8.89,11.43) 7(-8.89,8.89) 8(-8.89,6.35) 9(-8.89,3.81) 10(-8.89,1.27) 11(-8.89,-1.27) 12(-8.89,-3.81) 13(-8.89,-6.35) 14(-8.89,-8.89) 15(-8.89,-11.43) 16(-8.89,-13.97) 17(-8.89,-16.51) 18(-8.89,-19.05) 19(-8.89,-21.59) 20(-8.89,-24.13) 21(8.89,-24.13) 22(8.89,-21.59) 23(8.89,-19.05) 24(8.89,-16.51) 25(8.89,-13.97) 26(8.89,-11.43) 27(8.89,-8.89) 28(8.89,-6.35) 29(8.89,-3.81) 30(8.89,-1.27) 31(8.89,1.27) 32(8.89,3.81) 33(8.89,6.35) 34(8.89,8.89) 35(8.89,11.43) 36(8.89,13.97) 37(8.89,16.51) 38(8.89,19.05) 39(8.89,21.59) 40(8.89,24.13)
  silkscreen extent -10.75,-1.57 12.05,25.7, body extent -10.5,-25.5 10.5,26.8, height 10.1
R1206 [mm]
  rect 1.125x1.75 smd paste+0 mask+0.05: 1(-1.462,0) 2(1.463,0)
  silkscreen extent -1.26,-2.2 1.17,0.91, body extent -1.6,-0.8 1.6,0.8, height 0.55
R-0603 [mm]
  rect 0.75x0.9 smd paste+0 mask+0.05: 1(-0.765,0) 2(0.765,0)
  silkscreen extent 1.67,-3.16 2.47,-0.74, body extent -0.8,-0.4 0.8,0.4, height 0.47
SMA_132134 [mm]
  round 2.05 hole 1.5 paste-2539.97 mask+0.05: 1(0,0)
  round 2.25 hole 1.7 paste-2539.97 mask+0.05: 2(-2.54,-2.54) 2(-2.54,2.54) 2(2.54,-2.54) 2(2.54,2.54)
  silkscreen extent -3.68,-3.68 3.68,5.21, body extent -3.5,-3.5 3.5,3.5, height 8.1
SOD-123 [mm]
  rect 1.2x1.22 smd paste+0 mask+0.05: 1(-1.905,0) 2(1.905,0)
  silkscreen extent -1.26,-2.23 1.16,0.89, body extent -1.93,-0.9 1.93,0.9, height 1.35
SOIC8 [mm]
  rect 1.95x0.6 smd paste+0 mask+0.05: 1(-2.475,1.905) 2(-2.475,0.635) 3(-2.475,-0.635) 4(-2.475,-1.905) 5(2.475,-1.905) 6(2.475,-0.635) 7(2.475,0.635) 8(2.475,1.905)
  silkscreen extent -1.57,-2.56 1.44,4.4, body extent -3,-2.45 3,2.45, height 1.75
SOIC14 [mm]
  rect 1.95x0.6 smd paste+0 mask+0.05: 1(-2.475,3.81) 2(-2.475,2.54) 3(-2.475,1.27) 4(-2.475,0) 5(-2.475,-1.27) 6(-2.475,-2.54) 7(-2.475,-3.81) 8(2.475,-3.81) 9(2.475,-2.54) 10(2.475,-1.27) 11(2.475,0) 12(2.475,1.27) 13(2.475,2.54) 14(2.475,3.81)
  silkscreen extent -5,-4.44 1.32,4.44, body extent -3,-4.35 3,4.35, height 1.75
SOIC16 [mm]
  rect 1.95x0.6 smd paste+0 mask+0.05: 1(-2.475,4.445) 2(-2.475,3.175) 3(-2.475,1.905) 4(-2.475,0.635) 5(-2.475,-0.635) 6(-2.475,-1.905) 7(-2.475,-3.175) 8(-2.475,-4.445) 9(2.475,-4.445) 10(2.475,-3.175) 11(2.475,-1.905) 12(2.475,-0.635) 13(2.475,0.635) 14(2.475,1.905) 15(2.475,3.175) 16(2.475,4.445)
  silkscreen extent -1.31,-5.06 5,5.06, body extent -3,-4.95 3,4.95, height 1.75
SOT26 [mm]
  rect 1.1x0.6 smd paste+0 mask+0.04: 1(1.3,-0.95) 2(1.3,0) 3(1.3,0.95) 4(-1.3,0.95) 5(-1.3,0) 6(-1.3,-0.95)
  silkscreen extent -1.47,-1.77 1.57,3.1, body extent -1.5,-1.55 1.5,1.55, height 1.4
SSOP28_DB [mm]
  rect 1.75x0.45 smd paste+0 mask+0.045: 1(-3.6,4.225) 2(-3.6,3.575) 3(-3.6,2.925) 4(-3.6,2.275) 5(-3.6,1.625) 6(-3.6,0.975) 7(-3.6,0.325) 8(-3.6,-0.325) 9(-3.6,-0.975) 10(-3.6,-1.625) 11(-3.6,-2.275) 12(-3.6,-2.925) 13(-3.6,-3.575) 14(-3.6,-4.225) 15(3.6,-4.225) 16(3.6,-3.575) 17(3.6,-2.925) 18(3.6,-2.275) 19(3.6,-1.625) 20(3.6,-0.975) 21(3.6,-0.325) 22(3.6,0.325) 23(3.6,0.975) 24(3.6,1.625) 25(3.6,2.275) 26(3.6,2.925) 27(3.6,3.575) 28(3.6,4.225)
  silkscreen extent -2.88,-5.33 6.02,5.33, body extent -3.9,-5.1 3.9,5.1, height 2.1
SW_TL3305A [mm]
  rect 1.6x1.4 smd paste+0 mask+0.05: 1(-3.6,1.5) 1(3.6,1.5) 2(-3.6,-1.5) 2(3.6,-1.5)
  silkscreen extent -2.37,-2.37 2.37,4.15, body extent -4.05,-2.15 4.05,2.15, height 2.4
TANT_D [mm]
  rect 2.075x2.55 smd paste+0 mask+0.05: 1(-3.113,0) 2(3.113,0)
  silkscreen extent -4.41,-2.26 3.65,3.88, body extent -3.65,-2.15 3.65,2.15, height 3.1
TMR3_SIP8_15V [mm]
  rect 1.8x1.8 hole 1 mask+0.1: 1(0,0)
  round 1.8 hole 1 mask+0.1: 2(2.54,0) 3(5.08,0) 5(10.16,0) 6(12.7,0) 7(15.24,0) 8(17.78,0)
  silkscreen extent -3.55,-5.6 19.8,3.5, body extent -2,-5.6 19.8,3.5, height 11.2
TO220_3 [mm]
  rect 1.905x2 hole 1.1 paste-2539.97 mask+0.05: 1(0,0)
  oval 1.905x2 hole 1.1 paste-2539.97 mask+0.05: 2(2.54,0) 3(5.08,0)
  silkscreen extent -2.58,-2.85 7.66,3.27, body extent -2.59,-1.3 7.67,3.16, height 18.77
TP06R [mm]
  round 0.6 smd paste-1 mask+0.05: 1(0,0)
  silkscreen extent -1.06,-1.63 2.01,-0.83
USB_C_12401610 [mm]
  rect 0.3x0.7 smd paste+0 mask+0.04: A1(-2.75,5.02) A2(-2.25,5.02) A3(-1.75,5.02) A4(-1.25,5.02) A5(-0.75,5.02) A6(-0.25,5.02) A7(0.25,5.02) A8(0.75,5.02) A9(1.25,5.02) A10(1.75,5.02) A11(2.25,5.02) A12(2.75,5.02) B1(2.5,3.32) B2(2,3.32) B3(1.5,3.32) B4(1,3.32) B5(0.5,3.32) B6(0,3.32) B7(-0.5,3.32) B8(-1,3.32) B9(-1.5,3.32) B10(-2,3.32) B11(-2.5,3.32) B12(-3,3.32)
  round 1.4 hole 1.1 paste-2539.97 mask+0.04: SH(-4.49,-2.84) SH(-4.13,3.11) SH(4.13,3.11) SH(4.49,-2.84)
  round 0.65 hole 0.65 unplated paste-2539.97 mask+0.04: ""(-3.6,4.36)
  round 0.95 hole 0.95 unplated paste-2539.97 mask+0.04: ""(3.6,4.36)
  silkscreen extent -4.75,-1.8 4.75,6.92, body extent -4.6,-5.2 4.6,5.2, height 3.3
XAL7070 [mm]
  rect 1.92x6.5 smd paste+0 mask+0.05: 1(-2.41,0) 2(2.41,0)
  silkscreen extent -3.85,3.95 1.26,5.08, body extent -3.6,-3.75 3.6,3.75, height 4.6
XTAL_HC49 [mm]
  round 1.5 hole 0.8 paste-2539.97 mask+0.05: 1(0,0) 2(4.88,0)
  silkscreen extent -4.26,-3.65 5.64,2.53, body extent -3.09,-2.32 7.97,2.32, height 4.1

## Via types
v1: diameter 23.62, hole 11.81, Top Layer to Bottom Layer, tented both sides, 181 vias
v2: diameter 21.65, hole 9.84, Top Layer to Bottom Layer, tented both sides, 24 vias
v3: diameter 31.5, hole 15.75, Top Layer to Bottom Layer, tented both sides, 4 vias

## Nets (pads, with @x,y where several pads share a name; then routed paths per layer and width w, separated by ;. In a path a pad name is that pad's centre, name@x,y a point inside that pad or via, vN(x,y) a via of type N, cw(c..) or ccw(c..) an arc to the next point about the centre after c; other vN are vias at no path point)
+5V_SYS: C110.1 C111.1 C112.1 C113.1 C205.1 C206.1 C207.1 C1002.1 C1003.1 C1004.1 D300.2 J100.77 J100.79 J100.81 J100.83 J100.85 J100.87 J104.2 L200.2 R202.1 R1000.1 R1001.1 SW1000.1 U1000.16 U1101.3 U1102.3 | length 17926.1
  Top Layer w7.87: 582.68,3055.12 J100.87@648.03,3055.12 ; 582.68,3070.87 J100.85@648.03,3070.87 ; 582.68,3086.61 J100.83@648.03,3086.61 ; 582.68,3102.36 J100.81@648.03,3102.36 ; 582.68,3118.11 J100.79@648.03,3118.11 ; 582.68,3133.86 J100.77@648.03,3133.86
  Top Layer w15.75: 582.68,2934.06 582.68,2795.28 866.14,2795.28 866.14,3031.5 C112.1@868.11,3031.5 ; C113.1@866.14,2874.02 C113.1@868.11,2874.02
  Top Layer w23.61: C1004.1@4527.56,513.78 4573.9,513.78 4573.9,516.89 4580.71,547.24
  Top Layer w23.62: 4938.74,2402.57 4943.62,2397.65 5040,2397.65
  Top Layer w31.5: C111.1@472.44,2934.06 582.68,2934.06 582.68,3133.86 ; C110.1@472.44,3130.91 582.68,3130.91 582.68,3118.11 582.68,3102.36 582.68,3086.61 ; v1(547.32,3076.09) 572.16,3076.09 582.68,3086.61 ; 582.68,3055.12 582.68,3070.87 582.68,3086.61 ; 866.14,2795.28 1350.43,2310.99 3897.64,2310.99 ; C113.1@868.11,2874.02 C112.1@868.11,3031.5 ; v1(3747.96,4488.19) 3818.9,4488.19 3818.9,4545.35 3840.48,4566.93 3846.38,4569.88 C207.1@5414.37,4566.93 5458.74,4566.93 5458.74,4532.07 5585.28,4405.55 L200.2@5613.78,4405.55 ; R1001.1@3897.64,2329.72 3897.64,2310.99 ; U1000.16@4231.3,2773.43 4291.42,2773.43 4291.42,2806.96 4251.89,2846.48 v1(4251.89,2913.39) C1002.1@4293.31,2913.39 ; v1(4293.39,1664.17) U1101.3@4233.27,1664.17 4173.15,1664.17 4096.46,1740.87 C1003.1@4096.46,1968.5 4055.04,1968.5 4055.04,2134.84 3897.64,2292.25 3897.64,2310.99 ; R1000.1@4370.08,2762.8 4410.51,2762.8 4413.94,2759.37 4581.93,2759.37 4938.74,2402.57 ; v1(4380.87,1173.16) 4580.71,947.78 4580.71,798.03 ; 4580.71,547.24 4580.71,549.21 4580.71,798.03 ; U1102.3@4666.34,798.03 4580.71,798.03 ; 5040,2397.65 5193.54,2244.09 SW1000.1@5275.59,2244.09 ; C206.1@5611.22,4566.93 5611.22,4492.05 5639.17,4492.05 5650.87,4480.39 ; v1(5616.42,4181.03) 5613.78,4181.03 L200.2@5613.78,4330.71 L200.2@5613.78,4405.55 ; v1(5632.48,3668.31) R202.1@5708.66,3668.31 ; C205.1@5808.07,4566.93 5808.07,4492.05 5796.42,4480.39 5650.87,4480.39 ; L200.2@5613.78,4405.55 5613.78,4480.39 5650.87,4480.39
  Bottom Layer w31.5: J104.2@275.59,4151.97 218.9,4095.28 218.9,3338 480.81,3076.09 v1(547.32,3076.09) ; v1(3747.96,4488.19) 4293.39,3942.76 4293.39,2913.39 ; v1(4251.89,2913.39) 4293.39,2913.39 ; v1(4380.87,1173.16) 4293.39,1260.63 v1(4293.39,1664.17) 4293.39,2913.39 ; SW1000.1@5275.59,2244.09 5275.59,3311.43 v1(5632.48,3668.31) 5632.48,4164.99 v1(5616.42,4181.03)
+11VA: C211.1 C214.1 C701.1 C801.1 C901.1 D210.2 R210.1 R1006.1 U210.2 U212.5 U212.8 U700.7 U800.7 U900.7 | length 6413.1
  Top Layer w14.76: U900.7@5569.88,339.96 5621.61,339.96 5644.06,362.4 5652.56,362.4 ; U800.7@5569.88,969.88 5621.61,969.88 5644.06,992.31 5652.56,992.31 ; U700.7@5569.88,1599.8 5621.61,1599.8 5644.06,1622.23 5652.56,1622.23 ; U212.5@5687.99,2917.13 5739.72,2917.13 5762.17,2939.55 5826.77,2939.55 ; U212.8@5687.99,3067.13 5739.72,3067.13 5739.72,3058.97 5754.02,3044.7
  Top Layer w19.68: R1006.1@4881.89,2880.91 4881.89,2912.48 4913.46,2912.48 5131.06,3130.09 5887.24,3130.09 5897.95,3119.39 5897.95,3059.51 5831.06,2992.66 C214.1@5826.77,2992.66 ; 5652.56,362.4 5669.29,379.13 C901.1@5669.29,395.67 5624.02,440.94 5624.02,759.92 5729.92,865.82 5729.92,948.41 C801.1@5669.29,1009.06 ; 5652.56,992.31 C801.1@5669.29,1009.06 ; 5652.56,1622.23 C701.1@5669.29,1638.98 ; v1(5743.11,1655.51) C701.1@5669.29,1655.51 C701.1@5669.29,1638.98 ; 5754.02,3044.7 5786.81,3011.89 5826.77,3011.89 C214.1@5826.77,2992.66 ; v1(6502.95,2953.63) 6502.95,2913.39 6471.38,2913.39 6413.31,2855.31 C211.1@6338.58,2855.31 5911.02,2855.31 5826.77,2939.55 C214.1@5826.77,2973.43 C214.1@5826.77,2992.66 ; C801.1@5669.29,1009.06 C801.1@5669.29,1025.59 5624.02,1070.85 5624.02,1125.74 5729.92,1231.64 5729.92,1578.33 C701.1@5669.29,1638.98
  Bottom Layer w19.68: v1(5743.11,1655.51) 6325.2,2237.6 6325.2,2531.01 6502.95,2708.75 v1(6502.95,2953.63) 6556.69,3007.37 U210.2@6556.69,3188.98 6556.69,3361.42 D210.2@6581.1,3385.83
-11VA: C213.2 C702.1 C802.1 C902.1 D211.1 R212.1 R1008.1 U211.3 U700.4 U800.4 U900.4 | length 5980.9
  Top Layer w14.76: C902.1@5275.59,262.4 5300.83,262.4 5323.27,239.96 U900.4@5375,239.96 ; C802.1@5275.59,892.31 5300.83,892.31 5323.27,869.88 U800.4@5375,869.88 ; C702.1@5275.59,1522.23 5300.83,1522.23 5312.05,1511.02 ; 5323.27,1499.8 U700.4@5375,1499.8
  Top Layer w17.72: 5038.52,407.94 5039.51,425.66 5038.52,474.41 ; 5039.45,1036.45 5039.45,1104.33 ; 5194.88,787.4 5263.21,787.4
  Top Layer w19.68: 5038.52,407.94 5055.24,391.22 5309.05,391.22 5320.4,379.87 5320.4,322.37 C902.1@5275.59,277.56 C902.1@5275.59,262.4 ; 5038.52,474.41 5038.52,732.15 5093.78,787.4 5194.88,787.4 ; 5039.45,1036.45 5048.98,1026.91 5303.54,1026.91 5319.96,1010.52 5319.96,951.85 C802.1@5275.59,907.48 C802.1@5275.59,892.31 ; 5039.45,1104.33 5039.45,1113.06 5323.27,1396.89 5323.27,1499.8 5312.05,1511.02 ; R1008.1@5118.11,2605.31 5152.64,2605.31 5159.53,2598.43 D211.1@5866.14,2598.43 5925.28,2598.43 6282.48,2241.22 v1(6424.21,2241.22) R212.1@6424.21,2204.72 ; 5263.21,787.4 5323.27,847.46 5323.27,869.88 ; C702.1@5275.59,1522.23 C702.1@5275.59,1537.4 ; U700.4@5375,1499.8 5429.21,1499.8 v1(5432.4,1499.8) ; U211.3@6656.69,2480.31 6854.8,2282.18 C213.2@6854.82,2204.72
  Bottom Layer w19.68: v1(5432.4,1499.8) 5866.14,1933.54 D211.1@5866.14,2598.43 ; v1(6424.21,2241.22) 6424.21,2247.83 U211.3@6656.69,2480.31
ADC_CS_N: R401.2 U300.22 U400.20 | length 2476.9
  Top Layer w7.87: U400.20@2543.31,1142.72 v1(2710.63,1142.72) R401.2@2827.76,1259.84
  Bottom Layer w7.87: v1(2710.63,1142.72) 2734.48,1118.86 2869.8,1118.86 2893.31,1142.37 2893.31,1171.2 3249.8,1527.69 3337.25,1527.69 3382.61,1573.05 3382.61,2497.57 U300.22@3617.72,2732.68
ADC_DRDY_N: U300.29 U400.21 | length 2952.6
  Top Layer w7.87: U400.21@2543.31,1168.31 v1(2618.63,1168.31) ; v1(2888.52,2982.68) 2940.15,2982.68 2963.01,3005.53 3190.57,3005.53 U300.29@3617.72,3432.68
  Bottom Layer w7.87: v1(2618.63,1168.31) 2575.74,1211.2 2575.74,2669.9 v1(2888.52,2982.68)
ADC_RESET_N: R402.2 U300.4 U400.15 | length 3947
  Top Layer w7.87: U400.15@2543.31,1014.76 2587.67,1014.76 2645.82,956.62 2749.78,956.62 2827.76,1034.59 2827.76,1141.73 v1(2861.9,1141.73)
  Bottom Layer w7.87: v1(2861.9,1141.73) 2703.55,1300.08 2703.55,2229.55 3182.91,2708.9 3182.91,3967.49 U300.4@2917.72,4232.68
ADC_SYNC_N: R403.2 U300.5 U400.14 | length 3746.1
  Top Layer w7.87: U400.14@2259.84,1014.76 v1@2304.21,1014.76 ; v1(2312.54,1014.76) v1@2304.21,1014.76 ; R403.2@2394.68,826.77 2369.02,826.77 2369.02,817.15 2349.56,797.68 2308.82,797.68 2301.43,805.07 2301.43,888.26 2304.21,891.03 v1@2304.21,1014.76
  Bottom Layer w7.87: v1(2312.54,1014.76) 2312.54,3038.87 2678.21,3404.54 2678.21,3893.17 U300.5@2917.72,4132.68
ADJ_NEG: R212.2 R213.1 U211.1 | length 706.5
  Top Layer w7.87: R213.1@6345.47,2047.24 v1(6345.47,2084.95) 6354.45,2084.95 6463.5,2194.01 6463.5,2204.72 R212.2@6489.17,2204.72
  Bottom Layer w7.87: v1(6345.47,2084.95) 6345.47,2416.51 6409.29,2480.31 U211.1@6456.69,2480.31
ADJ_POS: R210.2 R211.1 U210.1 | length 513.9
  Top Layer w7.87: U210.1@6456.69,3188.98 6504.09,3188.98 6504.09,3141.56 6542.24,3103.42 6542.24,2913.39 ; R211.1@6502.95,2795.28 6528.62,2795.28 6542.24,2808.91 6542.24,2913.39 ; R210.2@6567.91,2913.39 6542.24,2913.39
ARM_REQUEST: R1011.2 U300.10 | length 1055.8
  Top Layer w7.87: U300.10@2917.72,3632.68 3065.62,3780.58 3836.39,3780.58 3865.08,3809.27 3865.08,3818.9 R1011.2@3890.75,3818.9
AVDD5: C215.1 C216.2 C402.1 C403.1 C407.1 C501.1 C503.1 C506.1 C600.1 C601.1 C605.1 C1100.1 U212.1 U212.2 U400.1 U401.2 U500.7 U501.7 U502.7 U600.7 U601.7 U1100.7 | length 13120.9
  Top Layer w5.91: v2(3316.93,1368.11) 3326.77,1377.95 3326.77,1399.61 3328.74,1401.57 3328.74,1403.54 3330.71,1403.54 3332.68,1405.51 3334.65,1405.51 3354.33,1425.2 U600.7@3354.33,1437.01 ; v2(3324.8,1309.06) 3348.43,1309.06 3350.39,1307.09 3352.36,1307.09 3354.33,1305.12 3358.27,1305.12 3360.24,1303.15 3362.2,1303.15 C600.1@3366.14,1301.18
  Top Layer w14.76: 629.92,1346.64 653.19,1346.64 675.61,1324.21 U500.7@727.36,1324.21 ; U501.7@766.73,812.4 818.48,812.4 840.91,789.98 861.2,789.98 ; 1579.74,553.74 1600.04,553.74 1622.46,576.18 U401.2@1674.21,576.18 ; U502.7@1672.24,1127.36 1723.99,1127.36 1746.42,1104.94 1766.72,1104.94 ; 1822.02,1134.63 1825.78,1138.38 ; 5423.23,2994.7 5441.38,3012.82 5441.38,3017.13 U212.2@5493.11,3017.13
  Top Layer w17.72: 629.92,1415.35 629.92,1498.03 ; 1062.99,1238.19 1062.99,1304.44
  Top Layer w19.68: 629.92,1346.64 629.92,1415.35 ; 629.92,1498.03 629.92,1588.4 642.78,1601.26 893.8,1601.26 1020.17,1474.89 ; 818.48,812.4 834.8,828.72 834.8,977.43 1062.99,1205.61 1062.99,1238.19 ; C501.1@846.46,1301.18 846.46,1336.69 881.96,1336.69 956.35,1411.08 ; 861.2,789.98 861.81,789.37 C503.1@905.51,789.37 905.51,753.86 1106.22,553.15 C407.1@1535.43,553.15 1579.13,553.15 1579.74,553.74 ; 1062.99,1304.44 956.35,1411.08 ; 1766.72,1104.94 1767.32,1104.33 C506.1@1811.02,1104.33 1822.02,1115.33 1822.02,1134.63 ; 1825.78,1138.38 1907.68,1138.38 2160.85,1391.56 ; C402.1@2206.69,1496.06 2171.18,1496.06 2160.85,1496.06 ; U400.1@2259.84,1347.44 2209.57,1347.44 2165.46,1391.56 2160.85,1391.56 ; C600.1@3366.14,1301.18 3410.51,1301.18 3432.09,1279.6 3503.94,1279.6 C601.1@3503.94,1241.14 3503.94,1202.68 3514.44,1192.17 3514.44,986.22 ; U601.7@3443.9,969.88 3491.67,969.88 3498.11,969.88 3514.44,986.22 ; v1(4042.37,1790.8) 2105.13,1790.8 1976.79,1662.46 1976.79,1604.61 2026.21,1555.19 2047.24,1555.19 C403.1@2047.24,1516.73 ; U1100.7@4231.3,812.4 4285.51,812.4 4286.46,813.34 v1(4294.49,813.34) 4309.92,828.74 C1100.1@4370.08,828.74 ; v1(4235.12,1218.01) 3814.47,1218.01 3618.18,1021.73 3582.68,1021.73 C605.1@3582.68,986.22 3514.44,986.22 ; v1(4854.88,2630.87) 4900.75,2630.87 5153.9,2884.04 5354.33,2884.04 ; 5423.23,2994.7 5375.59,2994.7 C215.1@5354.33,2973.43 5354.33,2884.04 ; U212.2@5493.11,3017.13 5547.32,3017.13 5547.32,3067.13 U212.1@5493.11,3067.13 ; C216.2@5588.58,2795.28 5553.07,2795.28 5553.07,2759.77 5543.78,2750.46 5487.91,2750.46 5354.33,2884.04 ; 956.35,1411.08 1020.17,1474.89 ; 1020.17,1474.89 1062.01,1516.73 C403.1@2047.24,1516.73 ; C403.1@2047.24,1516.73 2140.18,1516.73 2160.85,1496.06 ; 2160.85,1391.56 2160.85,1496.06
  Bottom Layer w5.91: v2(3316.93,1368.11) 3324.8,1360.24 v2(3324.8,1309.06)
  Bottom Layer w19.68: v1(4042.37,1790.8) 4235.12,1598.05 v1(4235.12,1218.01) 4294.49,1158.61 4294.49,1141.59 ; v1(4294.49,813.34) 4294.49,1141.59 ; v1(4854.88,2630.87) 4854.88,1602.55 4393.94,1141.59 4294.49,1141.59
BIAS_F_I: C700.1 K700.4 R704.2 R1110.1 TP700.1 | length 2314.1
  Top Layer w5.91: 6048.31,1514.74 6052.36,1518.78 6062.13,1518.78
  Top Layer w7.87: R1110.1@4731.3,1850.39 4756.97,1850.39 4756.97,1860.02 4777.6,1880.64 5817.72,1880.64 6069.41,1628.93 6069.41,1526.09 6062.13,1518.78 ; R704.2@5805.61,1535.43 5893.78,1535.43 ; C700.1@5944.88,1616.14 5944.88,1586.54 5893.78,1535.43 ; 6048.31,1514.74 5905.51,1514.74 ; K700.4@6161.42,1425.2 6116.06,1425.2 6096.14,1405.29 5917.56,1405.29 TP700.1@5905.51,1417.32 5905.51,1514.74 ; 5893.78,1535.43 5893.78,1526.47 5905.51,1514.74
BIAS_F_PHI: C900.1 K900.4 R904.2 R1118.1 TP900.1 | length 1655.5
  Top Layer w7.87: R1118.1@4921.26,203.74 4921.26,178.07 5000.47,98.86 5846.89,98.86 TP900.1@5905.51,157.48 5905.51,212.48 ; R904.2@5805.61,275.59 5893.78,275.59 ; C900.1@5944.88,356.3 5944.88,326.69 5893.78,275.59 ; K900.4@6161.42,165.35 6116.06,165.35 6068.94,212.48 5905.51,212.48 ; 5893.78,275.59 5893.78,224.21 5905.51,212.48
BIAS_F_Q: C800.1 K800.4 R804.2 R1114.1 TP800.1 | length 2002.7
  Top Layer w7.87: R1114.1@4652.56,1338.58 4683.23,1369.25 5190.71,1369.25 5213.66,1346.28 v1(5233.54,1346.28) ; v1(5757.83,861.15) 5805.59,861.15 R804.2@5805.61,905.51 5893.78,905.51 ; C800.1@5944.88,986.22 5944.88,956.62 5893.78,905.51 ; K800.4@6161.42,795.28 6116.06,795.28 6096.14,775.35 5917.56,775.35 TP800.1@5905.51,787.4 5893.78,799.14 5893.78,905.51
  Bottom Layer w7.87: v1(5233.54,1346.28) 5718.7,861.15 v1(5757.83,861.15)
BIAS_OUT_I: J700.1 K700.3 R706.1 TP701.1 | length 915.6
  Top Layer w5.91: TP701.1@6614.17,1535.43 6618.11,1527.56 6622.05,1523.62 v1(6622.05,1503.94)
  Top Layer w7.87: K700.3@6161.42,1511.81 6206.77,1511.81 6232.44,1537.48 6612.13,1537.48 TP701.1@6614.17,1535.43 6621.06,1528.54 R706.1@6621.06,1377.95
  Bottom Layer w5.91: v1(6622.05,1503.94) 6681.1,1503.94 6685.04,1507.87 6692.91,1507.87 6696.85,1511.81 6700.79,1511.81 6704.72,1515.75 6708.66,1515.75 6712.6,1519.68 6716.54,1519.68 6720.47,1523.62 6724.41,1523.62 6728.35,1527.56 6736.22,1527.56 6740.16,1531.5 6748.03,1531.5 6751.97,1535.43 6759.84,1535.43 6763.78,1539.37 6767.72,1539.37 6771.65,1543.31 6775.59,1543.31 6779.53,1547.24 6787.4,1547.24 6791.34,1551.18 6795.28,1551.18 6799.21,1555.12 6807.09,1555.12 6811.02,1559.06 6814.96,1559.06 6818.9,1562.99 6822.83,1562.99 6826.77,1566.93 6834.65,1566.93 6838.58,1570.87 6842.52,1570.87 J700.1@6850.39,1574.8
BIAS_OUT_PHI: J900.1 K900.3 R906.1 TP901.1 | length 873.1
  Top Layer w7.87: K900.3@6161.42,251.97 6206.77,251.97 6232.44,277.64 6612.13,277.64 TP901.1@6614.17,275.59 TP901.1@6621.06,268.7 ; R906.1@6621.06,118.11 TP901.1@6621.06,268.7 ; J900.1@6850.39,314.96 6667.32,314.96 TP901.1@6621.06,268.7
BIAS_OUT_Q: J800.1 K800.3 R806.1 TP801.1 | length 873.1
  Top Layer w7.87: K800.3@6161.42,881.89 6206.77,881.89 6232.44,907.56 6612.13,907.56 TP801.1@6614.17,905.51 TP801.1@6621.06,898.62 ; R806.1@6621.06,748.03 TP801.1@6621.06,898.62 ; J800.1@6850.39,944.88 6667.32,944.88 TP801.1@6621.06,898.62
BUCK_BST: C204.1 U200.1 | length 120.9
  Top Layer w7.87: U200.1@5295.37,4012.01 5347.28,4063.9 5356.3,4063.9 C204.1@5356.3,4102.36
BUCK_COMP: C209.1 R204.1 U200.6 | length 819.7
  Top Layer w5.91: U200.6@5492.03,3912.01 5530.59,3912.01 5554.96,3887.65 5559.53,3887.65
  Top Layer w7.87: C209.1@5435.04,3543.31 5464.65,3543.31 5464.65,3524.81 5485.83,3503.63 5593.39,3503.63 5738.35,3648.61 5738.35,3754.27 5666.81,3825.79 5629.92,3825.79 5601.3,3825.79 5601.3,3845.89 5559.53,3887.65
BUCK_COMP_RC: C208.1 R204.2 | length 259.6
  Top Layer w7.87: R204.2@5629.92,3890.75 5629.92,3865.08 5655.59,3865.08 5768.62,3752.04 5787.4,3752.04 C208.1@5787.4,3722.44
BUCK_EN: R201.2 U200.3 | length 207.2
  Top Layer w5.91: 5204.25,3887.65 5232.44,3887.65 5256.81,3912.01 U200.3@5295.37,3912.01
  Top Layer w7.87: R201.2@5150.59,3818.9 5176.26,3818.9 5176.26,3859.66 5204.25,3887.65
BUCK_FB: R202.2 R203.1 U200.5 | length 484.4
  Top Layer w7.87: U200.5@5492.03,3862.01 5531.57,3862.01 5660.31,3733.27 5708.66,3733.27 5708.66,3707.6 5695.04,3693.97 5551.18,3693.97 R203.1@5551.18,3668.31
BUCK_SS: C203.1 U200.4 | length 213.5
  Top Layer w7.87: C203.1@5275.59,3683.07 5275.59,3712.67 5294.09,3712.67 5314.06,3732.63 5314.06,3843.33 U200.4@5295.37,3862.01
BUCK_SW: C204.2 L200.1 U200.8 | length 672.6
  Top Layer w7.87: C204.2@5431.1,4102.36 5460.71,4102.36 5490.24,4072.85 5531.57,4072.85 ; U200.8@5492.03,4012.01 5531.57,4012.01 5531.57,4072.85 ; L200.1@5803.54,4330.71 5803.54,4192.84 5683.54,4072.85 5531.57,4072.85
CM5_3V3: C100.1 C301.1 J100.78 J100.84 J100.86 J103.1 U101.5 U301.5 | length 3957.7
  Top Layer w7.87: J103.1@275.59,3661.42 318.97,3661.42 536.74,3879.19 2426.87,3879.19 2449.76,3856.3 ; v1(737.6,3133.86) v1@745.59,3133.86 ; J100.86@769.29,3070.87 745.59,3070.87 745.59,3086.61 ; J100.84@769.29,3086.61 745.59,3086.61 ; J100.78@769.29,3133.86 v1@745.59,3133.86 ; C100.1@2383.86,3661.42 2413.46,3661.42 2413.46,3680.98 2442.59,3710.1 ; U101.5@2485.73,3856.3 2449.76,3856.3 ; U301.5@2682.58,3541.34 2646.58,3541.34 2646.58,3549.13 2646.74,3549.29 2646.74,3576.61 2600.39,3622.96 C301.1@2600.39,3661.42 2570.79,3661.42 2522.11,3710.1 2442.59,3710.1 ; 745.59,3086.61 v1@745.59,3133.86 ; 2442.59,3710.1 2442.59,3849.16 2449.73,3856.3
  Bottom Layer w7.87: J103.1@275.59,3661.42 318.97,3661.42 464.45,3515.94 612.11,3515.94 835.55,3292.5 835.55,3230.08 739.33,3133.86 v1(737.6,3133.86)
CM5_ACT_N: J100.21 TP100.1 | length 404.7
  Top Layer w7.87: TP100.1@393.7,3385.83 458.63,3385.83 v1(610.47,3537.67) ; J100.21@648.03,3574.8 675.18,3574.8 v1(681.46,3581.07)
  Bottom Layer w7.87: v1(610.47,3537.67) 638.05,3537.67 v1(681.46,3581.07)
CM5_ARM_REQ: J100.50 R1010.1 R1011.1 | length 3399.8
  Top Layer w5.91: J100.50@769.29,3354.33 792,3354.33 792,3355.29 793,3356.28 ; v1(2465.25,3825.78) 2474.1,3834.63 2653.69,3834.63 ; 2905.52,3880.83 2912.08,3887.39 3129.37,3887.39
  Top Layer w7.87: 793,3356.28 937.65,3500.94 v1(1949.53,3500.94) ; 2653.69,3834.63 2655.74,3834.63 2701.94,3880.83 2905.52,3880.83 ; 3129.37,3887.39 3131.72,3885.03 3818.9,3885.03 ; R1010.1@3818.9,3943.9 3818.9,3918.23 3818.9,3885.03 ; R1011.1@3825.79,3818.9 3825.79,3878.14 3818.9,3885.03
  Bottom Layer w7.87: v1(1949.53,3500.94) 2274.37,3825.78 v1(2465.25,3825.78)
CM5_BOOT_N: J100.93 JP100.1 | length 540.9
  Top Layer w7.87: J100.93@648.03,3007.87 671.73,3007.87 v1(680.07,3007.87)
  Bottom Layer w7.87: JP100.1@275.59,2755.91 318.97,2755.91 570.94,3007.87 v1(680.07,3007.87)
CM5_FAN_PWM: J100.19 J104.4 | length 537.7
  Top Layer w5.91: v1@624.33,3588.6 625.32,3589.59 625.32,3590.55 J100.19@648.03,3590.55
  Top Layer w7.87: v1(616.16,3588.6) v1@624.33,3588.6
  Bottom Layer w7.87: J104.4@275.59,3951.97 616.16,3611.4 v1(616.16,3588.6)
CM5_FAN_TACH: J100.16 J104.3 | length 736.3
  Top Layer w5.91: J100.16@769.29,3622.05 792,3622.05 792,3623.01 v1@793,3624
  Top Layer w7.87: v1@793,3624 v1(801.29,3624)
  Bottom Layer w7.87: J104.3@275.59,4051.97 373.32,4051.97 v1(801.29,3624)
CM5_HEARTBEAT: J100.54 R1005.1 U1000.10 | length 3898.5
  Top Layer w5.91: 3620.16,2784.53 3629.92,2784.53 3634.04,2780.41
  Top Layer w7.87: J100.54@769.29,3322.83 v1(836.35,3322.83) ; v1(1302.53,2784.53) 3620.16,2784.53 ; 3634.04,2780.41 3840.66,2780.41 3871.97,2749.09 3897.64,2749.09 3897.64,2723.43 3897.64,2695.85 3995.04,2598.43 4077.09,2598.43 4182.99,2492.52 4182.99,2473.43 U1000.10@4231.3,2473.43
  Bottom Layer w7.87: v1(836.35,3322.83) 1302.53,2856.65 v1(1302.53,2784.53)
CM5_PMIC_EN: J100.99 JP101.1 | length 615.9
  Top Layer w7.87: v1(624.33,2940.3) 624.33,2960.63 J100.99@648.03,2960.63
  Bottom Layer w7.87: JP101.1@354.33,2480.31 354.33,2523.7 624.33,2793.7 v1(624.33,2940.3)
CM5_PWR_BUTTON: J100.92 SW100.1 | length 1287.9
  Top Layer w7.87: J100.92@769.29,3023.62 745.59,3023.62 745.59,2950.05 762.8,2932.85 v1(769.94,2932.85) ; v1(1078.74,2231.69) SW100.1@1078.74,2185.04 SW100.1@1362.2,2185.04
  Bottom Layer w7.87: v1(769.94,2932.85) 1078.74,2624.05 v1(1078.74,2231.69)
CM5_SCL: J100.56 J103.4 | length 521.8
  Top Layer w5.91: v1@734.06,3305.13 744.63,3305.13 746.58,3307.09 J100.56@769.29,3307.09
  Top Layer w7.87: v1(729.3,3300.37) v1@734.06,3305.13
  Bottom Layer w7.87: J103.4@275.59,3361.42 668.25,3361.42 v1(729.3,3300.37)
CM5_SDA: J100.58 J103.3 | length 628
  Top Layer w5.91: J100.58@769.29,3291.34 792,3291.34 794.72,3294.06 v1(801.21,3294.06)
  Bottom Layer w7.87: J103.3@275.59,3461.42 633.85,3461.42 v1(801.21,3294.06)
CM5_UART_RX: J100.51 U301.4 | length 2200
  Top Layer w7.87: J100.51@648.03,3338.58 700.99,3338.58 v1(712.42,3350.02) ; v1(813.82,3239.08) 831.85,3221.04 v1(1954.55,3221.04) ; v1(2198.22,3398.59) 2578.63,3398.59 2646.58,3466.54 U301.4@2682.58,3466.54
  Bottom Layer w7.87: v1(712.42,3350.02) 813.82,3248.62 v1(813.82,3239.08) ; v1(1954.55,3221.04) 2020.67,3221.04 v1(2198.22,3398.59)
CM5_UART_TX: J100.55 U302.2 | length 2444.6
  Top Layer w7.87: v1(616.46,3307.09) J100.55@648.03,3307.09 ; v1(964.68,2946.08) 2361.01,2946.08 2629.01,3214.08 2629.01,3267.72 U302.2@2593.01,3267.72
  Bottom Layer w7.87: v1(616.46,3307.09) 616.46,3221.3 891.68,2946.08 v1(964.68,2946.08)
CM5_USB_N: J101.3 U100.6 | length 654.2
  Top Layer w5.91: v1(2322.83,4171.26) 2332.6,4171.26 U100.6@2367.62,4171.26
  Top Layer w7.87: J101.3@1986.61,3716.54 2013.03,3716.54 v1(2019.19,3722.7)
  Bottom Layer w7.87: v1(2019.19,3722.7) 2019.19,3867.62 v1(2322.83,4171.26)
CM5_USB_P: J101.5 U100.4 | length 616.3
  Top Layer w7.87: J101.5@1986.61,3700.79 2049.05,3700.79 v1(2055.57,3707.31) ; v1(2322.83,4096.46) 2331.62,4096.46 U100.4@2367.62,4096.46
  Bottom Layer w7.87: v1(2055.57,3707.31) 2055.57,3829.2 v1(2322.83,4096.46)